# Altium PCB PCB-LAYOUT.PcbDoc (part 1 of 3)
Units mm, origin at the board's own origin, x right, y up, seen from the top; angles counter-clockwise.
Board outline 90 x 80.5 mm, 4 copper layers (Top Layer, Int1 (GND), Int2 (PWR), Bottom Layer), stack 1.564 mm thick; 224 components, 118 nets, 645 pads, 657 vias.
Unrouted connection lines stored in the file: 1.
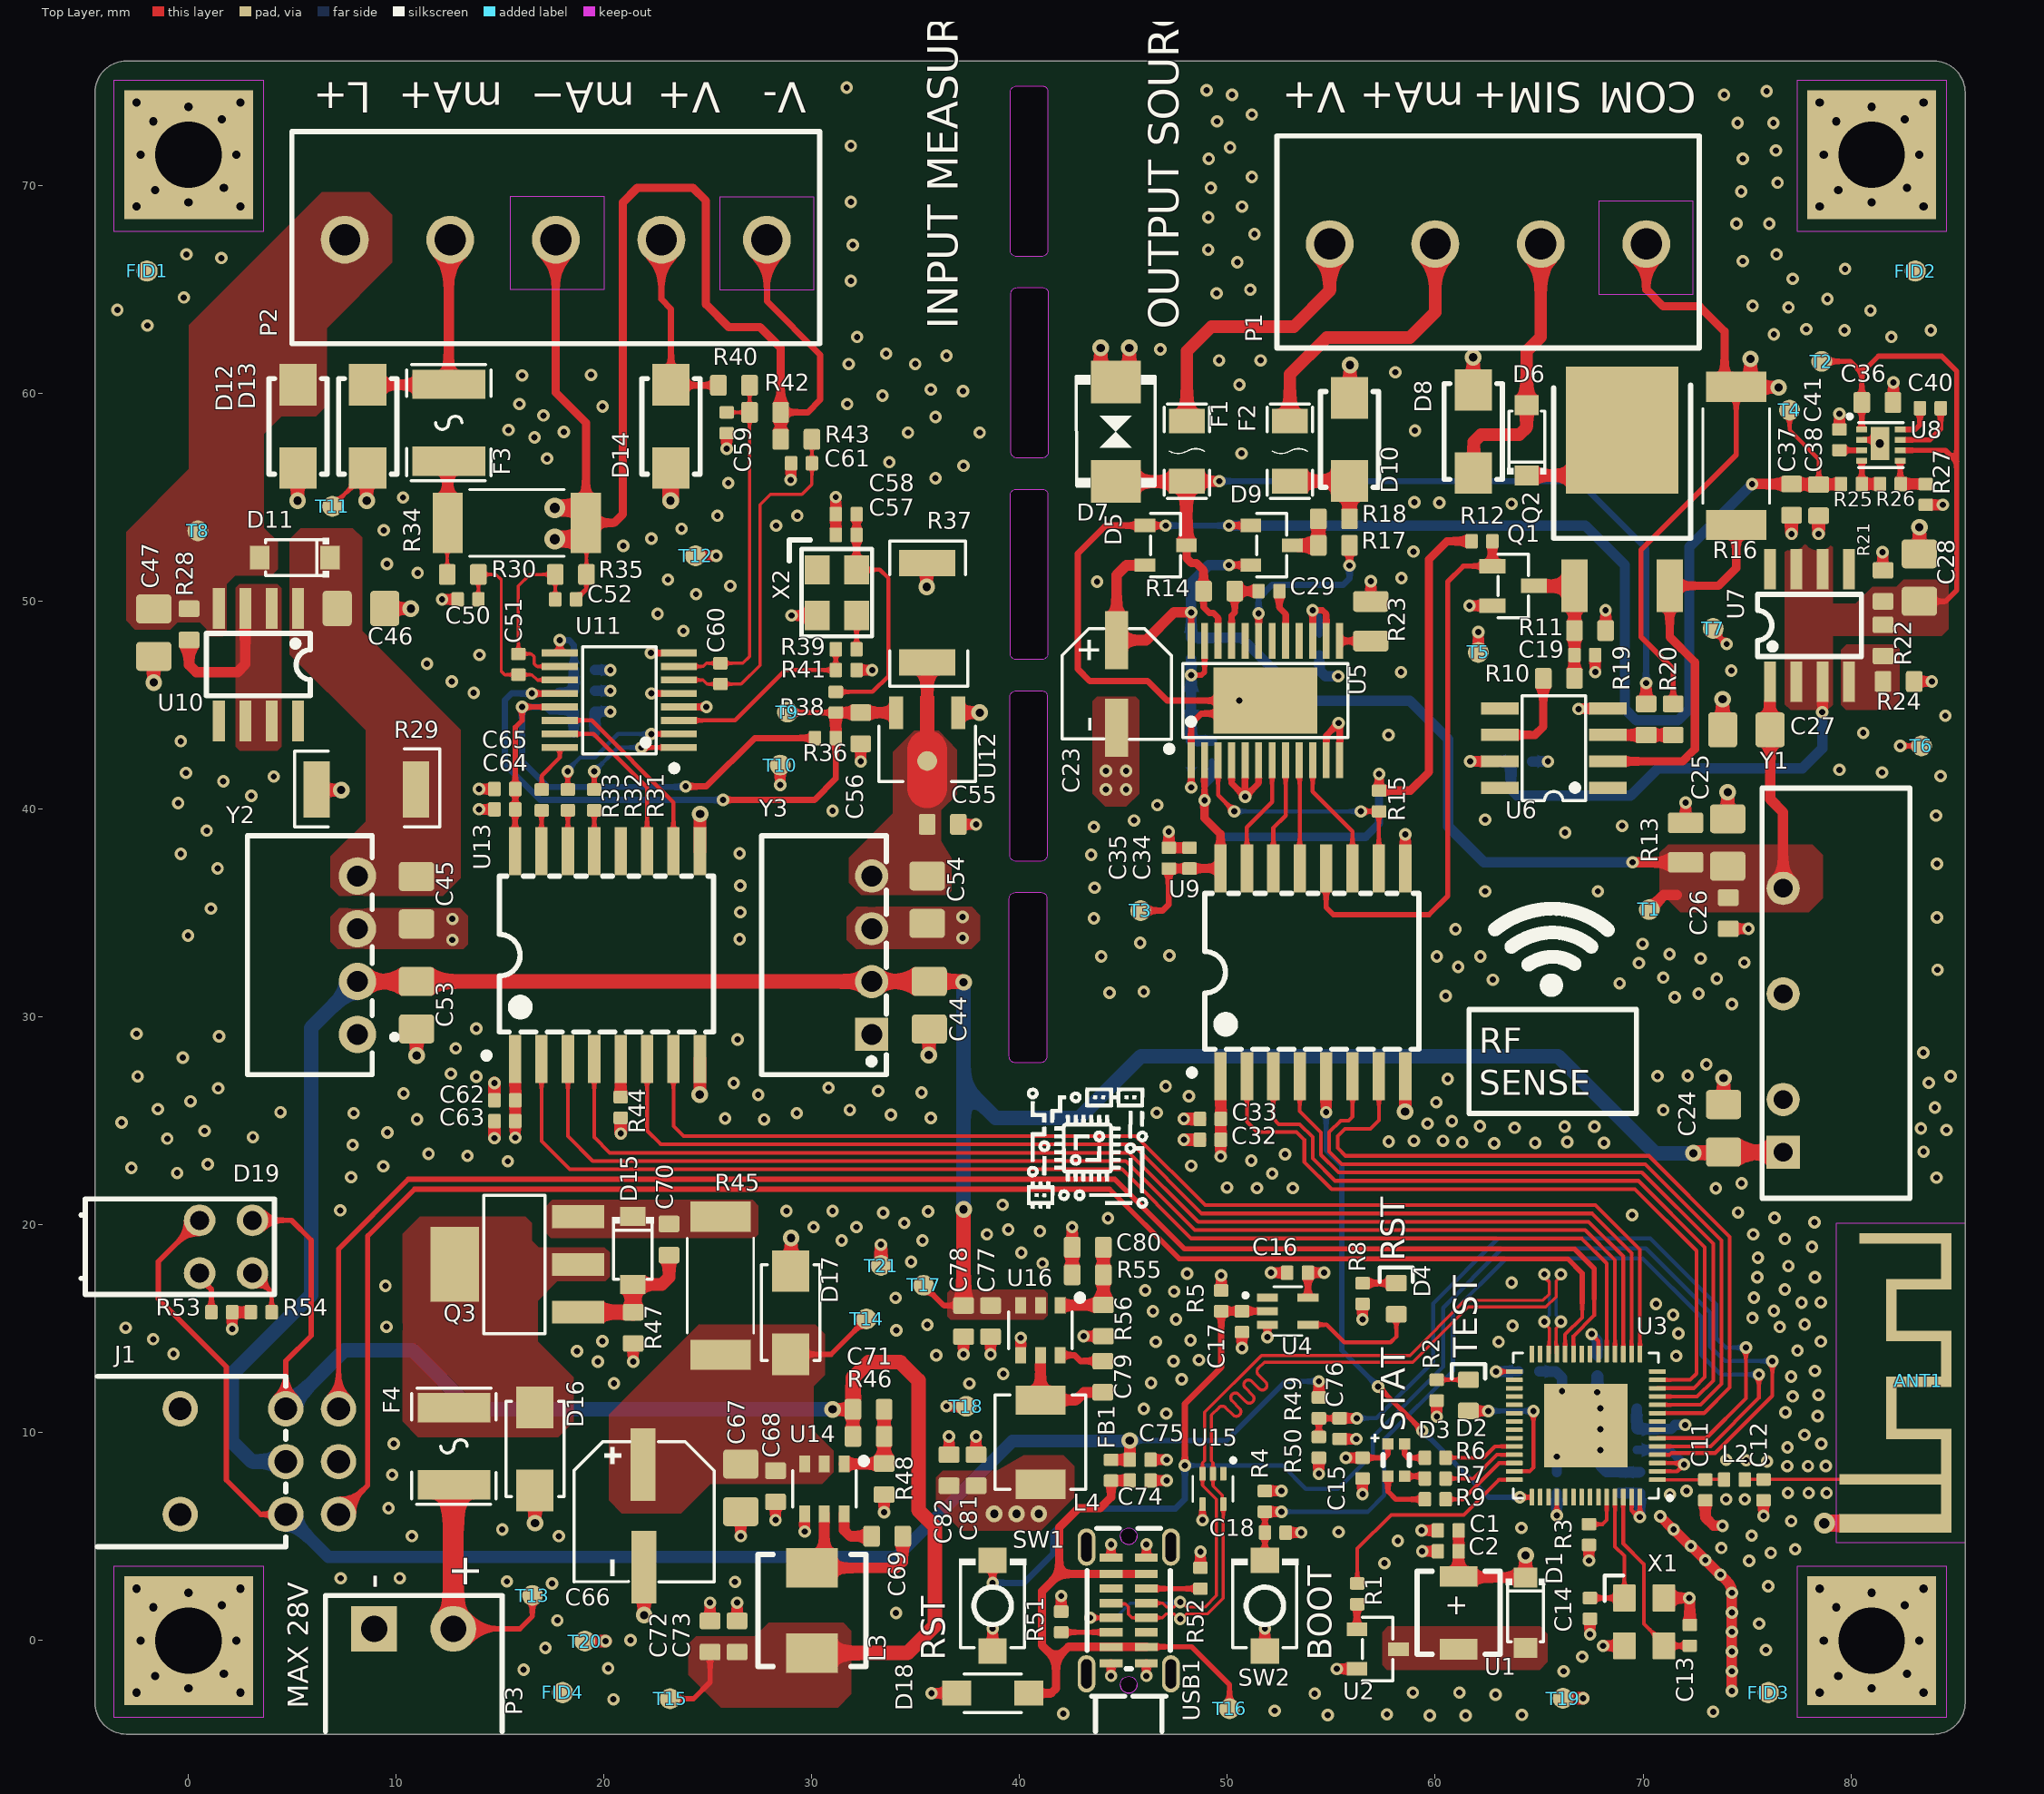
[diagram p0: Top Layer view]
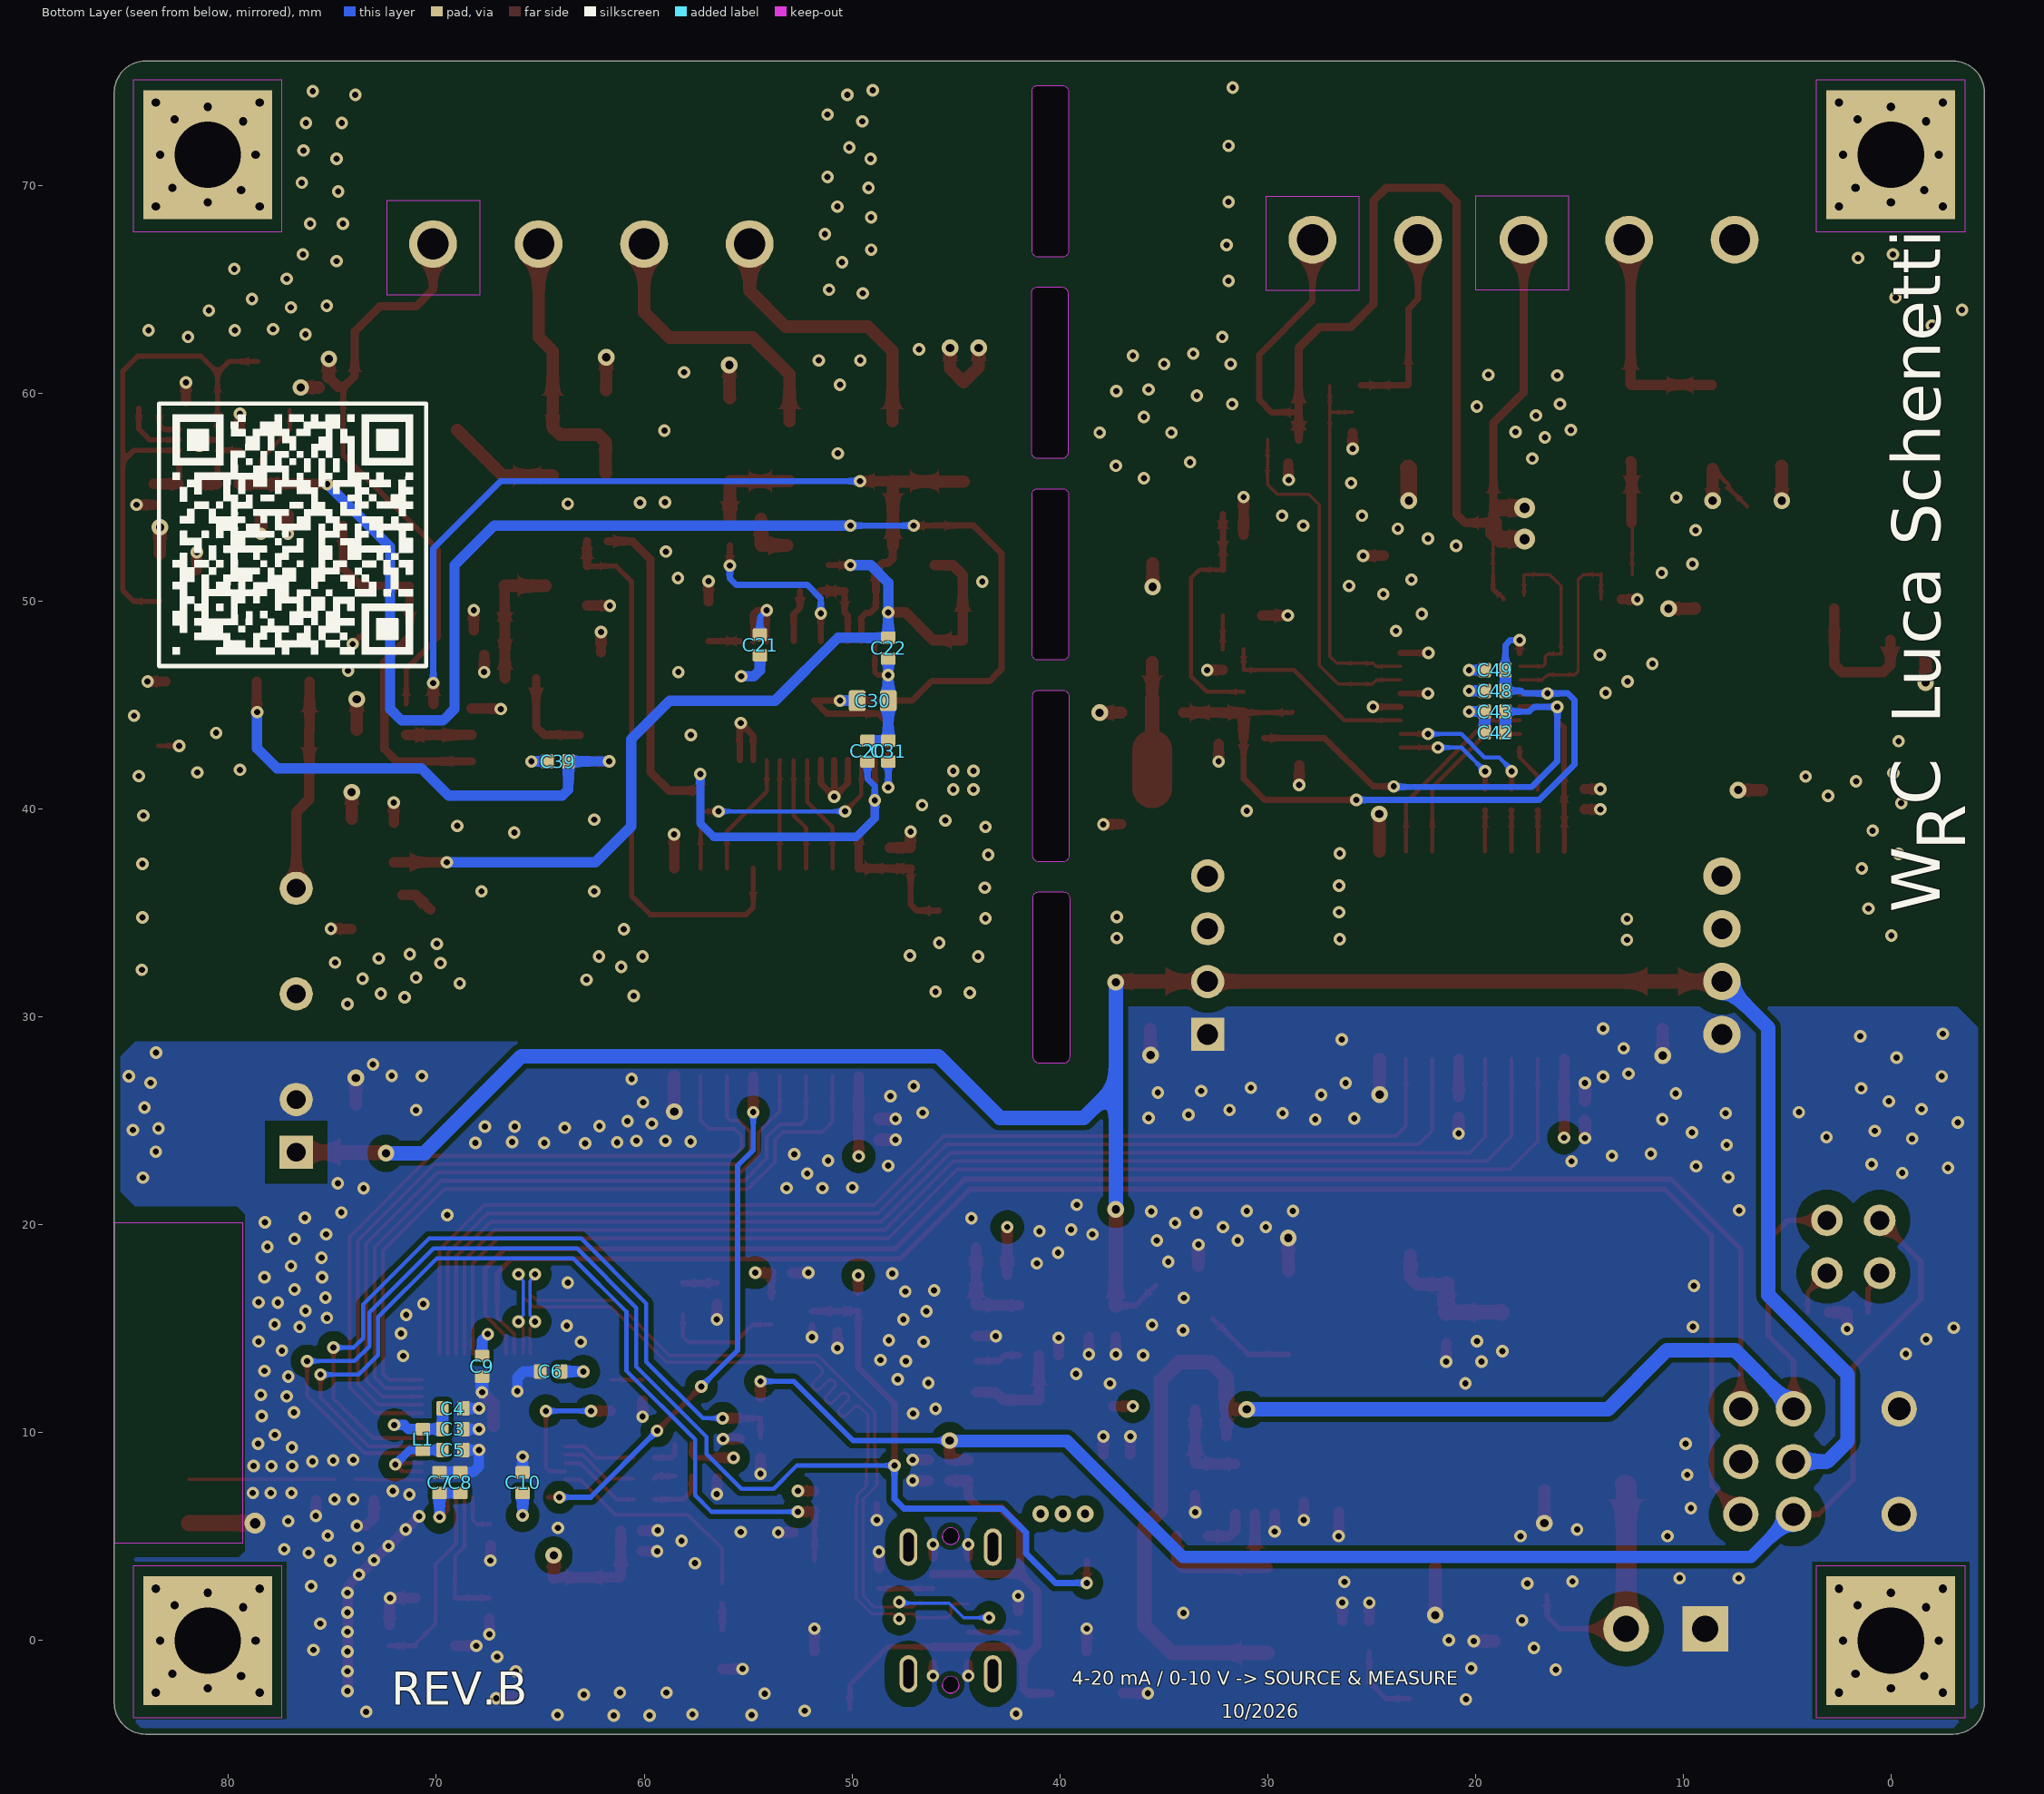
[diagram p1: Bottom Layer view, seen from below]
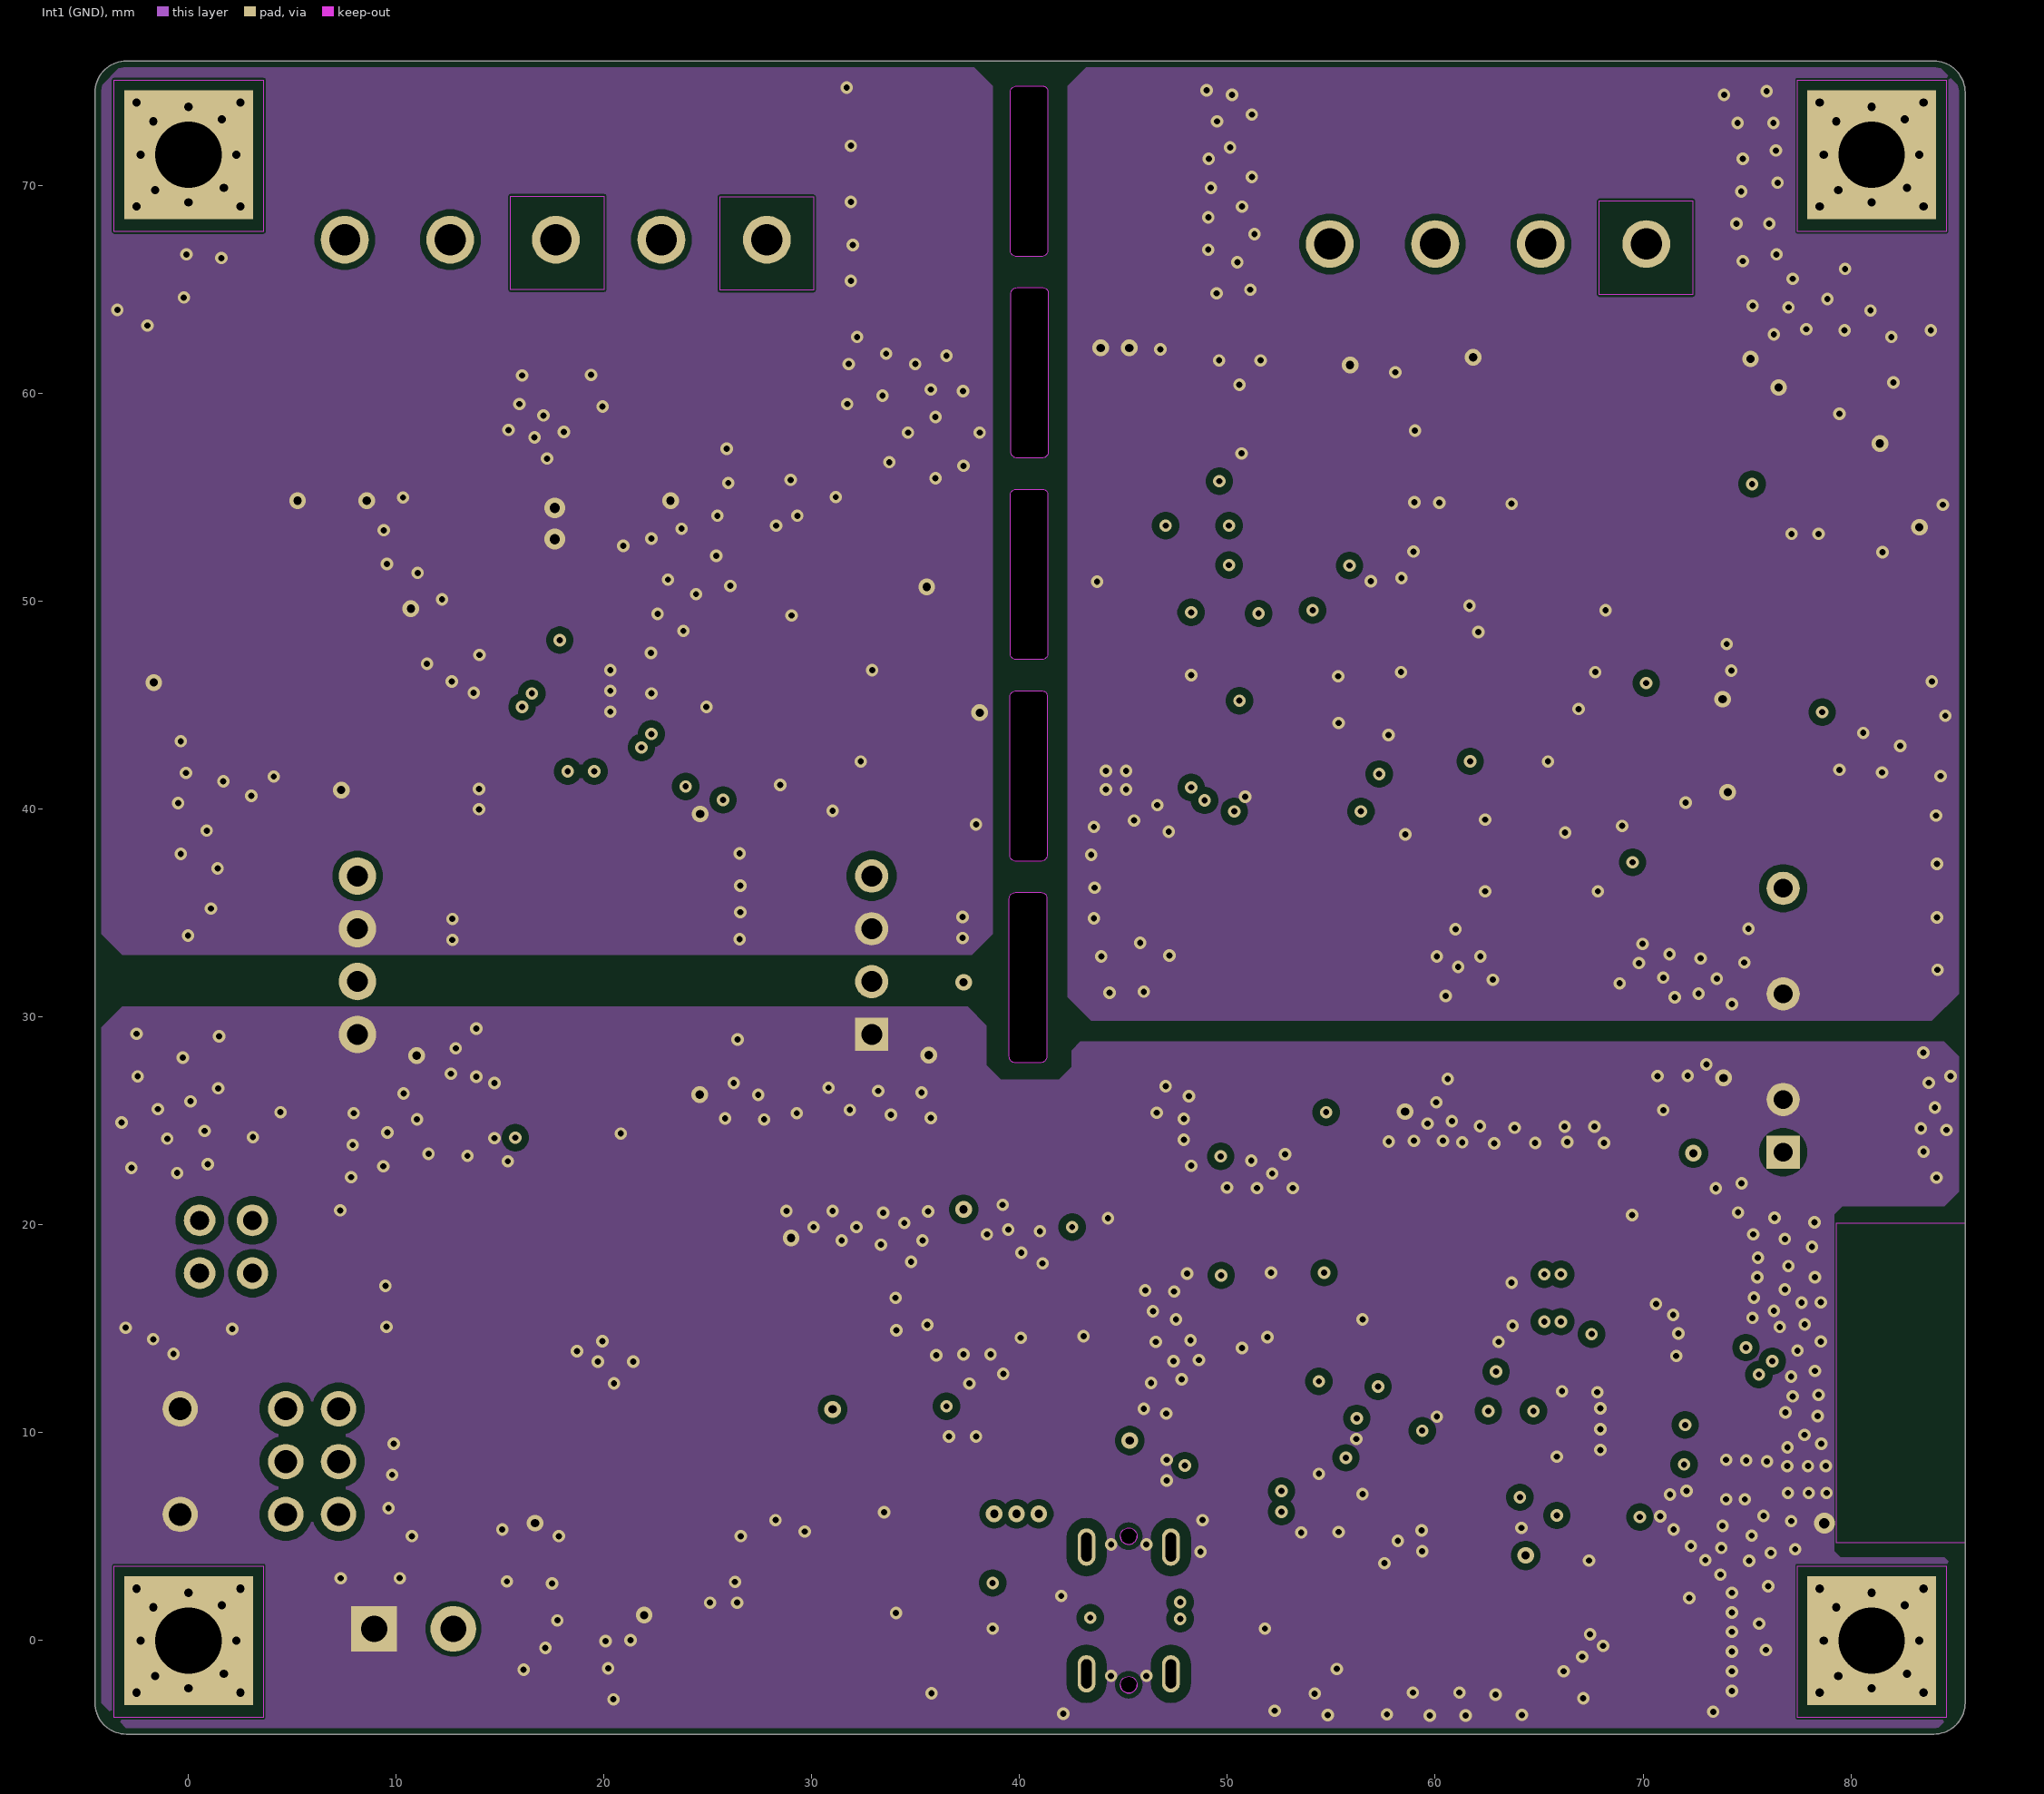
[diagram p2: Int1 (GND)]
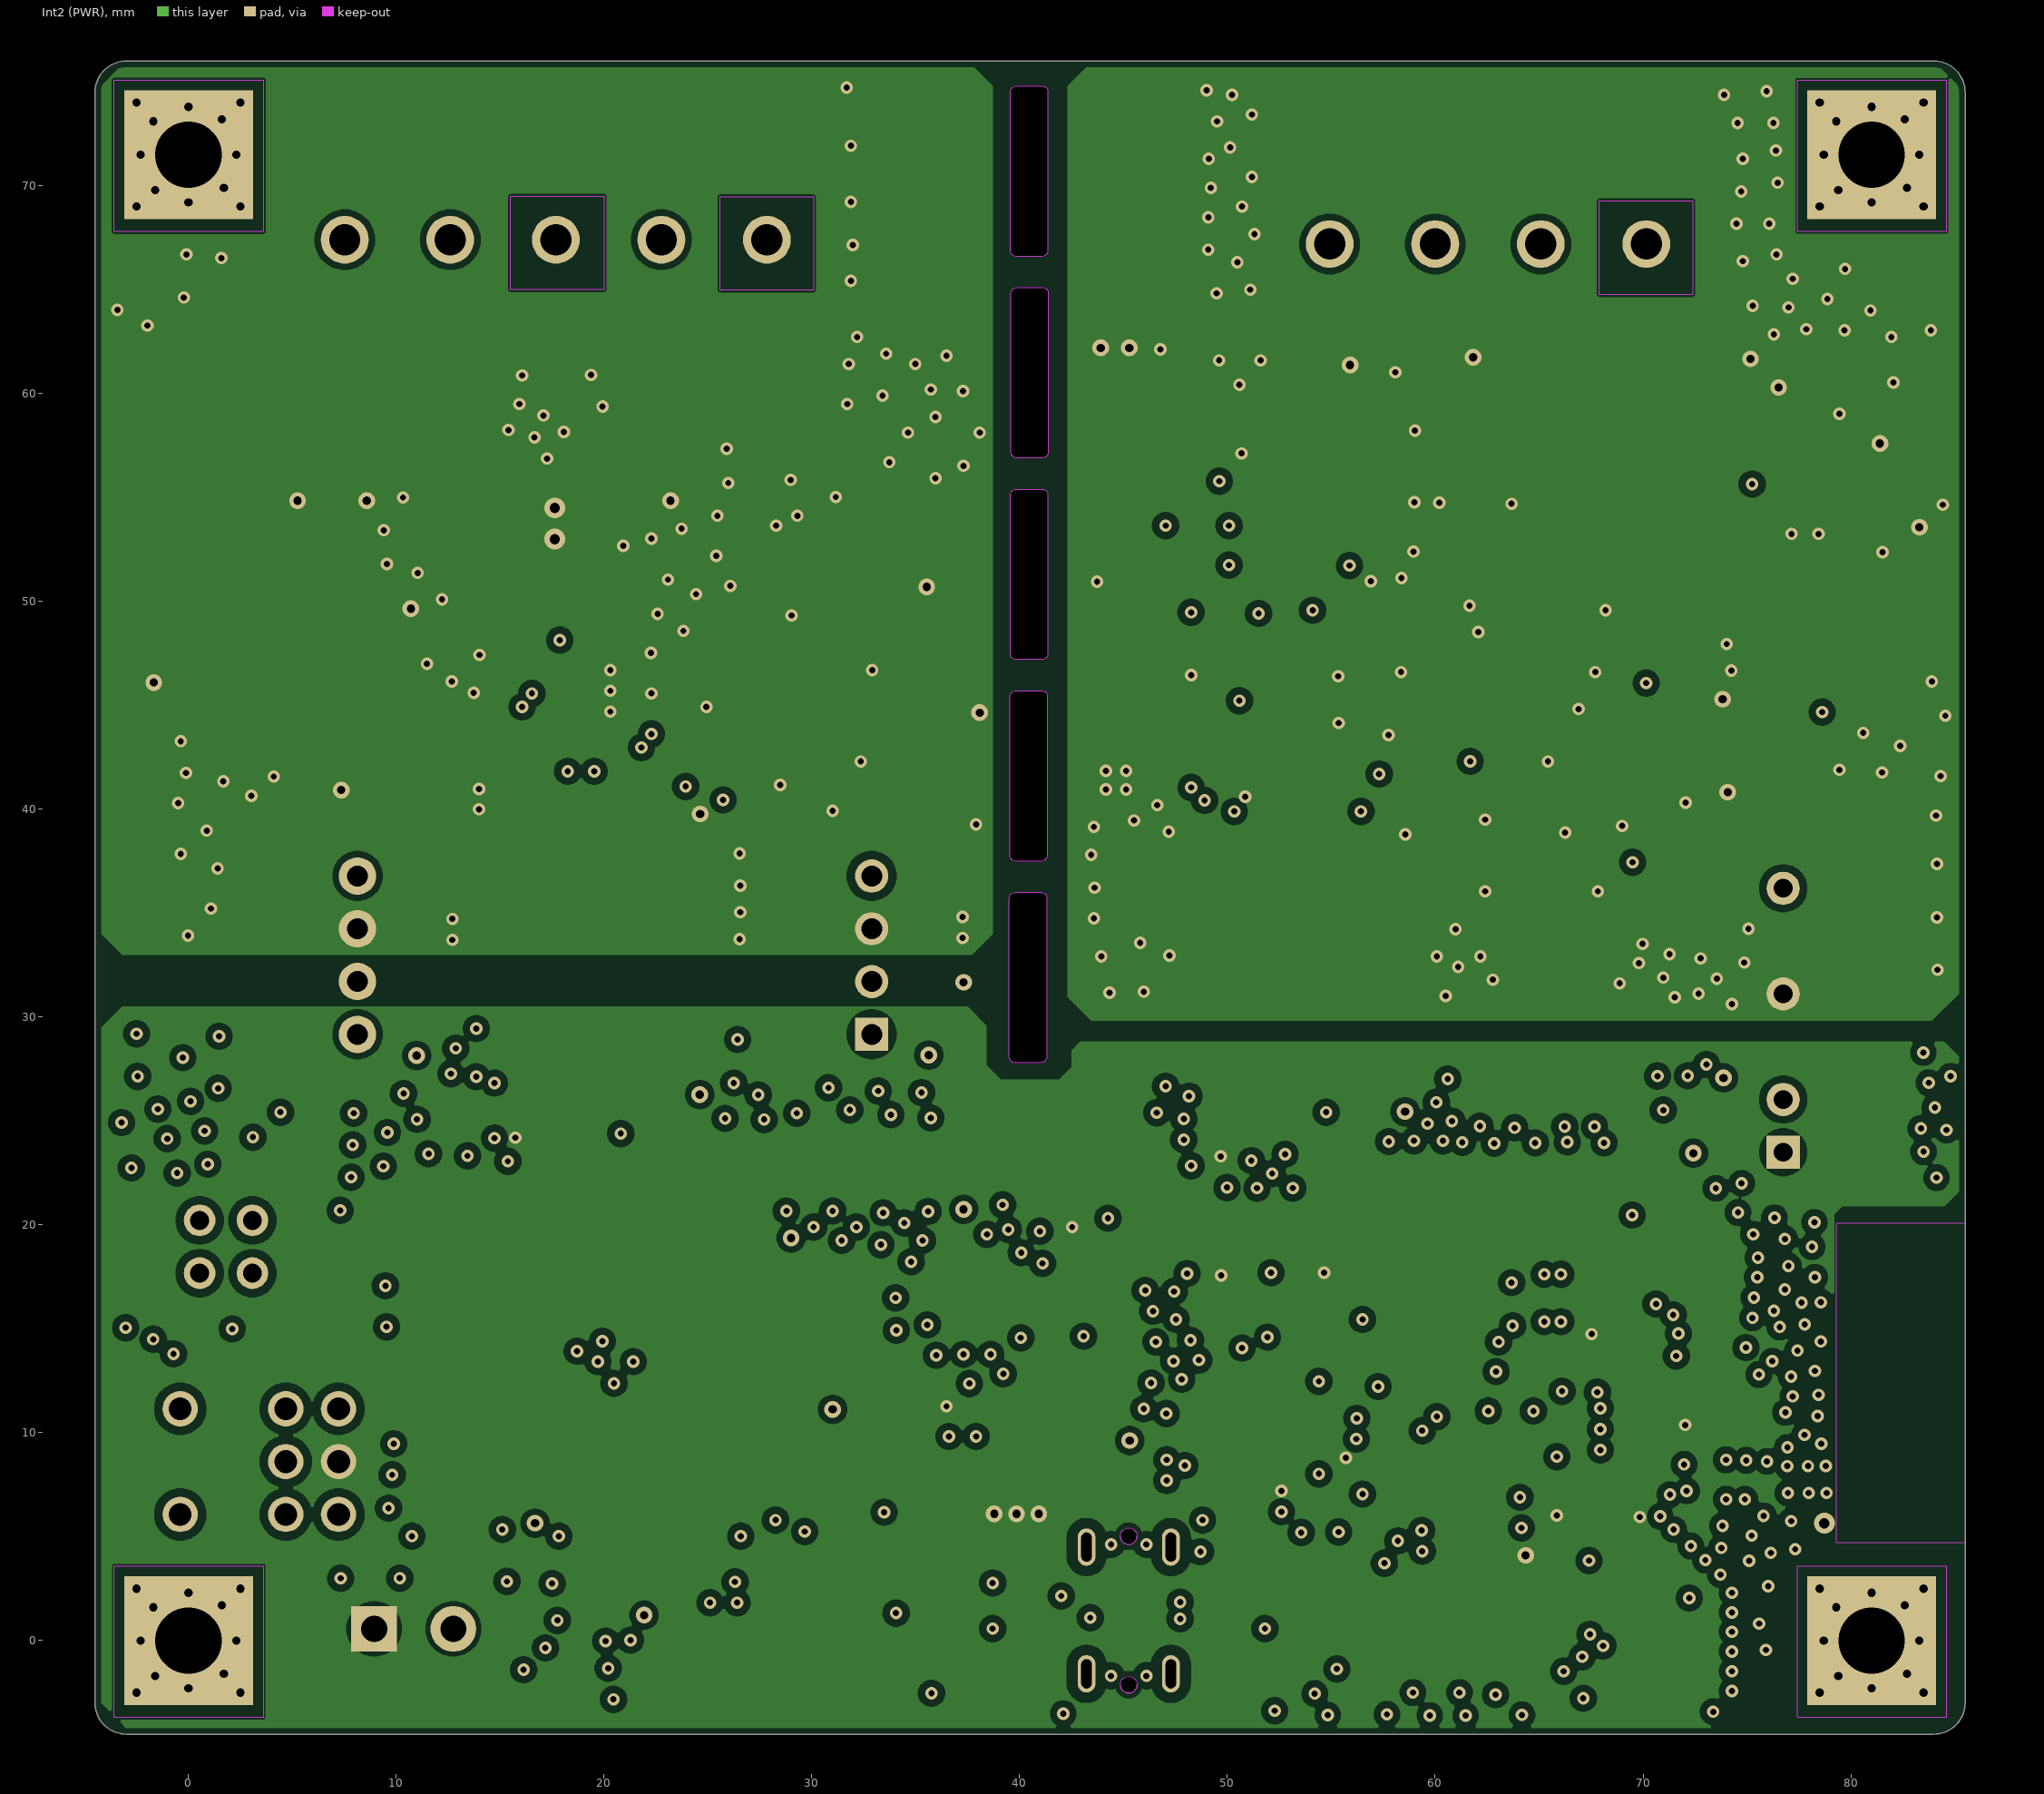
[diagram p3: Int2 (PWR)]
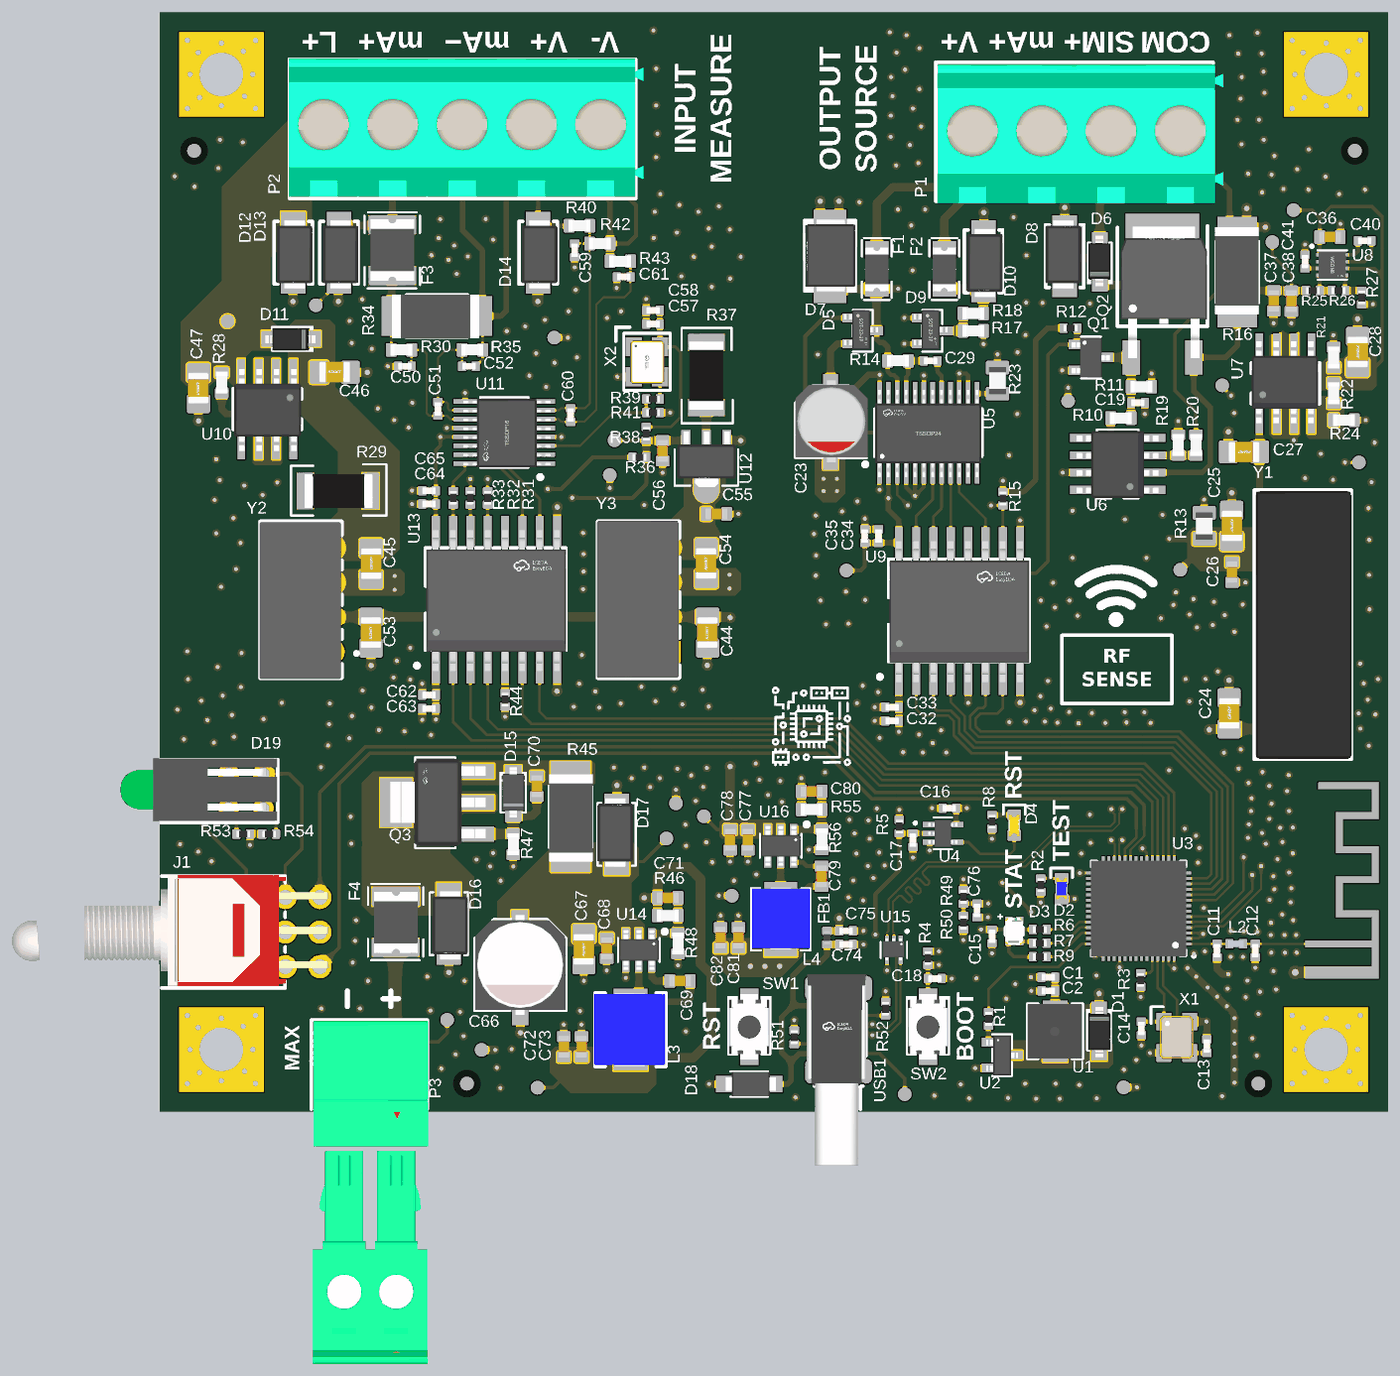
[diagram p6: 3D render of the assembled board from above, using the file's embedded part models]
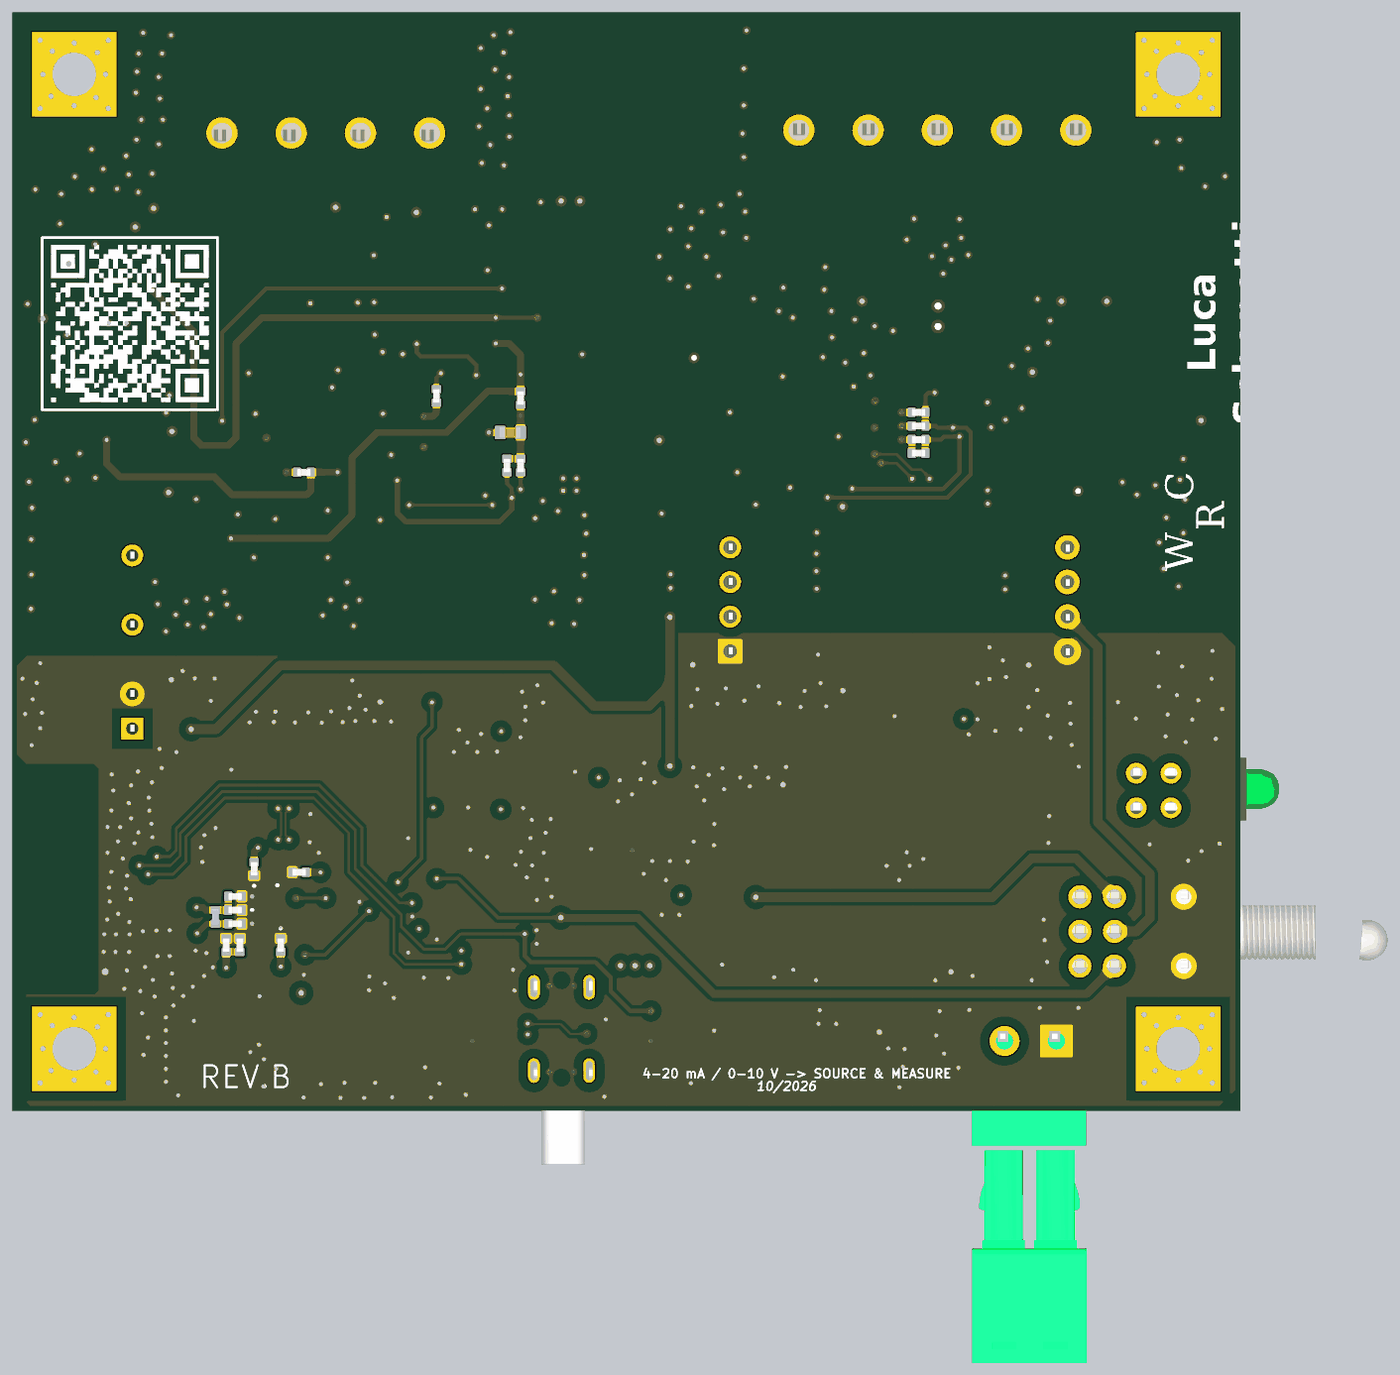
[diagram p7: 3D render of the assembled board from below, using the file's embedded part models]

## Layer stack, top to bottom
Top Solder: solder mask 0.0254, SM-001, Dk 4
Top Layer: signal copper 0.035
Dielectric 1: prepreg 0.0994, PP-017, Dk 4.3
Int1 (GND): signal copper 0.0152
Dielectric 3: core 1.265, Core-039, Dk 4.8
Int2 (PWR): signal copper 0.0152
Dielectric 5: prepreg 0.0994, PP-017, Dk 4.3
Bottom Layer: signal copper 0.035
Bottom Solder: solder mask 0.0254, SM-001, Dk 4

## Board outline
-3,-4.5 cw(c-3,-3) -4.5,-3 -4.5,74.5 cw(c-3,74.5) -3,76 84,76 cw(c84,74.5) 85.5,74.5 85.5,-3 cw(c84,-3) 84,-4.5
cut-out: 41.05,36 cw(c41.05,35.75) 41.3,35.75 41.3,28.1 cw(c41,28.1) 41,27.8 39.8,27.8 cw(c39.8,28.1) 39.5,28.1 39.5,35.7 cw(c39.8,35.7) 39.8,36
cut-out: 41.075,45.7 cw(c41.075,45.45) 41.325,45.45 41.325,37.8 cw(c41.025,37.8) 41.025,37.5 39.825,37.5 cw(c39.825,37.8) 39.525,37.8 39.525,45.4 cw(c39.825,45.4) 39.825,45.7
cut-out: 41.1,55.4 cw(c41.1,55.15) 41.35,55.15 41.35,47.5 cw(c41.05,47.5) 41.05,47.2 39.85,47.2 cw(c39.85,47.5) 39.55,47.5 39.55,55.1 cw(c39.85,55.1) 39.85,55.4
cut-out: 41.125,65.1 cw(c41.125,64.85) 41.375,64.85 41.375,57.2 cw(c41.075,57.2) 41.075,56.9 39.875,56.9 cw(c39.875,57.2) 39.575,57.2 39.575,64.8 cw(c39.875,64.8) 39.875,65.1
cut-out: 41.1,74.8 cw(c41.1,74.55) 41.35,74.55 41.35,66.9 cw(c41.05,66.9) 41.05,66.6 39.85,66.6 cw(c39.85,66.9) 39.55,66.9 39.55,74.5 cw(c39.85,74.5) 39.85,74.8

## Design rules (kind name [scope] priority, off if disabled: settings)
BoardOutlineClearance [All] p1: gap=0.2 ignorepadtopadclearanceinfootprint=FALSE except(0: Arc-SplitContinuation Track-SplitContinuation SMDPad-SplitContinuation THPad-SplitContinuation Via-SplitContinuation Fill-SplitContinuation Poly-SplitContinuation Region-SplitContinuation Text-SplitContinuation; 0.001: Track-OutlineEdge; 0.3: Arc-OutlineEdge Arc-SplitBarrior Track-SplitBarrior SMDPad-OutlineEdge SMDPad-SplitBarrior THPad-OutlineEdge THPad-SplitBarrior Via-OutlineEdge Via-SplitBarrior Fill-OutlineEdge Fill-SplitBarrior Poly-OutlineEdge Poly-SplitBarrior Region-OutlineEdge Region-SplitBarrior Text-OutlineEdge Text-SplitBarrior)
Clearance [All] p1: gap=0.1 ignorepadtopadclearanceinfootprint=TRUE except(0: Arc-Arc Arc-Track; 0.15: Arc-Text Track-Text SMDPad-Text THPad-Text Via-Text Region-Text Text-Text; 0.2: Arc-SMDPad Arc-THPad Arc-Via SMDPad-SMDPad SMDPad-THPad SMDPad-Via SMDPad-Poly THPad-Via Via-Via Poly-Hole; 0.25: Track-Poly; 0.275: Arc-Hole Track-Hole; 0.4: Arc-Fill Arc-Poly Track-Fill SMDPad-Fill Via-Fill Fill-Fill Fill-Poly Poly-Poly; 0.45: THPad-THPad; 0.5: Via-Poly Fill-Text Fill-Hole Poly-Text; 0.7: THPad-Poly; 1: THPad-Fill)
DiffPairsRouting DiffPairsRouting_USB [InDifferentialPairClass('DIFF_USB_90Ω')] p1: maxlimit=0.234 minlimit=0.18 mostfreqgap=0.234 toplayer_maxgap=0.18 toplayer_prefgap=0.18 toplayer_minwidth=0.146 toplayer_maxwidth=0.146 toplayer_prefwidth=0.146 bottomlayer_maxgap=0.18 bottomlayer_prefgap=0.18 bottomlayer_minwidth=0.146 bottomlayer_maxwidth=0.146 bottomlayer_prefwidth=0.146 impedanceprofiledriven=TRUE impedanceprofileid={1DC226F2-B0FA-4F82-BAED-851CE40D1095} impedanceprofilevalue=90.000000 maxuncoupledlength=30
Height [All] p1: minheight=0 maxheight=1000 prefheight=12.7
HoleSize [All] p1: absolutevalues=TRUE maxlimit=5 minlimit=0.3 maxpercent=80.000 minpercent=20.000
HoleToHoleClearance [All] p1: gap=0.254 allowstackedmicrovias=FALSE
MinimumSolderMaskSliver [All] p1: minsoldermaskwidth=0
PlaneConnect [All] p1: planeconnectstyle=Direct reliefexpansion=0.508 reliefentries=4 reliefconductorwidth=0.254 reliefairgap=0.254
PolygonConnect [All] p1: connectstyle=Direct reliefconductorwidth=0.254 reliefentries=4 polygonreliefangle="90 Angle" airgapwidth=0.254
RoutingVias [All] p1: holewidth=0.3 width=0.6 viastyle="Through Hole" minholewidth=0.3 minwidth=0.4 maxholewidth=2 maxwidth=5
SilkToSilkClearance [All] p1: silktosilkclearance=0.15
SilkToSolderMaskClearance [IsPad] p1: minsilkscreentomaskgap=0 clearancetoexposedcopper=TRUE
SolderMaskExpansion [All] p1: expansion=0.102 istentingtop=FALSE
UnRoutedNet [All] p1: checkbadconnections=TRUE
Width "Antenna 1" [InNet('LNA_IN_A')] p1: maxlimit=0.151 minlimit=0.127 preferedwidth=0.151 toplayer_minwidth=0.151 bottomlayer_minwidth=0.151 impedanceprofiledriven=TRUE impedanceprofileid={3F663633-82B3-4F44-8612-F3D688D30A75} impedanceprofilevalue=50.000000 minimp=50.000000 maximp=50.000000 favimp=50.000000
Width Antenna [InNet('LNA_IN')] p2: maxlimit=0.151 minlimit=0.127 preferedwidth=0.151 toplayer_minwidth=0.151 bottomlayer_minwidth=0.151 impedanceprofiledriven=TRUE impedanceprofileid={3F663633-82B3-4F44-8612-F3D688D30A75} impedanceprofilevalue=50.000000 minimp=50.000000 maximp=50.000000 favimp=50.000000
Width [All] p3: maxlimit=3 minlimit=0.01 preferedwidth=0.2 minimp=50.000000 maximp=50.000000 favimp=50.000000
21 further rules are at their usual default settings.

## Classes and differential pairs
differential pair class DIFF_USB_90Ω: USB-C_MCU_D
component class "PWR RAIL": C66 C67 C68 C69 C70 C71 C72 C73 C74 C75 C76 C77 C78 C79 C80 C81 C82 D15 D16 D17 D18 D19 F4 FB1 FID1 FID2 FID3 FID4 J1 L3 L4 P3 P4 Q3 R45 R46 R47 R48 R49 R50 R51 R52 R53 R54 R55 R56 T13 T14 T15 T16 T17 T18 T19 T20 T21 U14 U15 U16 USB1
component class MCU: ANT1 C1 C2 C3 C4 C5 C6 C7 C8 C9 C10 C11 C12 C13 C14 C15 C16 C17 C18 D1 D2 D3 D4 L1 L2 R1 R2 R3 R4 R5 R6 R7 R8 R9 SW1 SW2 U1 U2 U3 U4 X1
component class DAC: C19 C20 C21 C22 C23 C24 C25 C26 C27 C28 C29 C30 C31 C32 C33 C34 C35 C36 C37 C38 C39 C40 C41 D5 D6 D7 D8 D9 D10 F1 F2 P1 Q1 Q2 R10 R11 R12 R13 R14 R15 R16 R17 R18 R19 R20 R21 R22 R23 R24 R25 R26 R27 T1 T2 T3 T4 T5 T6 T7 U5 U6 U7 U8 U9 Y1
component class ADC: C42 C43 C44 C45 C46 C47 C48 C49 C50 C51 C52 C53 C54 C55 C56 C57 C58 C59 C60 C61 C62 C63 C64 C65 D11 D12 D13 D14 F3 P2 R28 R29 R30 R31 R32 R33 R34 R35 R36 R37 R38 R39 R40 R41 R42 R43 R44 T8 T9 T10 T11 T12 U10 U11 U12 U13 X2 Y2 Y3
differential pair USB-C_MCU_D: +USB-C_MCU_D_P -USB-C_MCU_D_N

## Components (designator, comment, footprint, x,y, rotation, side; value= is the part's Value field where it differs from the comment)
ANT1 "PCB Antenna 2.4GHz 50Ohm" ANT_IFA_USB_2_4GHZ_50R 79.45,5.65 r90 top
C1 "10u" CAP_0402 60.625,5.3 r0 top
C2 "100n" CAP_0402 60.625,4.3 r0 top
C3 "10u" CAP_0402 69.2,10.175 r0 bottom
C4 "100n" CAP_0402 69.2,11.175 r0 bottom
C5 "1u" CAP_0402 69.2,9.175 r0 bottom
C6 "1u" CAP_0402 64.5,12.95 r180 bottom
C7 "1u" CAP_0402 69.85,7.6 r270 bottom
C8 "100n" CAP_0402 68.85,7.6 r270 bottom
C9 "100n" CAP_0402 67.8,13.2 r90 bottom
C10 "100n" CAP_0402 65.85,7.6 r270 bottom
C11 "1p2" CAP_0402 73,7.25 r90 top
C12 "1p5" CAP_0402 75.8,7.25 r90 top
C13 "15p" CAP_0402 72.25,0.25 r270 top
C14 "15p" CAP_0402 67.45,1.55 r90 top
C15 "100n" CAP_0402 56.5,8.3 r90 top
C16 "100n" CAP_0402 53.375,17.7 r0 top
C17 "100n" CAP_0402 50.7,15.35 r90 top
C18 "100n" CAP_0402 52.3,5.2 r180 top
C19 "22n" CAP_0402 67.2,47.425 r180 top
C20 "100n" CAP_0402 49.25,42.8 r270 bottom
C21 "100n" CAP_0402 54.425,47.9 r90 bottom
C22 "100n" CAP_0402 48.25,47.75 r90 bottom
C23 "10u" CAP_ALEL_5x5.4 44.75,46.1 r270 top
C24 "4u7" CAP_0805 73.875,24.65 r270 top
C25 "10u" CAP_0805 74.075,38.4 r270 top
C26 "100n" CAP_0603 74.1,35 r90 top
C27 "10u" CAP_0805 74.975,43.825 r180 top
C28 "1u" CAP_0805 83.3,51.15 r270 top
C29 "4n7" CAP_0402 52,50.5 r0 top
C30 "10u" CAP_0603 49,45.225 r0 bottom
C31 "100n" CAP_0402 48.25,42.8 r270 bottom
C32 "1u" CAP_0402 49.175,24.1 r0 top
C33 "100n" CAP_0402 49.175,25.1 r0 top
C34 "100n" CAP_0402 47.175,37.65 r270 top
C35 "1u" CAP_0402 48.175,37.65 r270 top
C36 "10u" CAP_0603 81.277,59.576 r180 top
C37 "10u" CAP_0603 77.15,54.9 r90 top
C38 "10u" CAP_0603 78.45,54.875 r90 top
C39 "100n" CAP_0402 64.15,42.3 r180 bottom
C40 "1u" CAP_0402 83.825,59.3 r180 top
C41 "4u7" CAP_0402 79.452,57.776 r270 top
C42 "10u" CAP_0402 19.05,43.7 r180 bottom
C43 "100n" CAP_0402 19.05,44.7 r180 bottom
C44 "1u" CAP_0805 35.65,30.575 r90 top
C45 "1u" CAP_0805 10.975,35.625 r270 top
C46 "1u" CAP_0805 8.3,49.663 r0 top
C47 "1u" CAP_0805 -1.675,48.5 r90 top
C48 "10u" CAP_0402 19.05,45.7 r180 bottom
C49 "100n" CAP_0402 19.05,46.7 r180 bottom
C50 "2n7" CAP_0402 13.45,50.1 r180 top
C51 "27n" CAP_0402 15.875,46.975 r270 top
C52 "2n7" CAP_0402 18.15,50.1 r180 top
C53 "4u7" CAP_0805 10.975,30.575 r90 top
C54 "10u" CAP_0805 35.55,35.65 r90 top
C55 "1u" CAP_0603 36.3,39.275 r180 top
C56 "10u" CAP_0603 32.35,43.9 r90 top
C57 "10u" CAP_0402 31.65,53.2 r0 top
C58 "100n" CAP_0402 31.65,54.2 r0 top
C59 "1n" CAP_0402 25.9,58.6 r270 top
C60 "10n" CAP_0402 25.6,46.525 r90 top
C61 "1n" CAP_0402 29.5,56.65 r180 top
C62 "1u" CAP_0402 15.225,26 r0 top
C63 "100n" CAP_0402 15.225,25 r0 top
C64 "100n" CAP_0402 15.225,40 r0 top
C65 "1u" CAP_0402 15.225,40.975 r0 top
C66 "47u" CAP_ALEL_6.3x5.4 22.1,6.15 r270 top
C67 "10u" CAP_0805 26.575,7.35 r90 top
C68 "100n" CAP_0603 28.25,7.425 r90 top
C69 "100n" CAP_0603 33.625,5.025 r180 top
C70 "47n" CAP_0603 23.125,19.3 r90 top
C71 "47p" CAP_0603 32.725,11.125 r180 top
C72 "22u" CAP_0603 25.1,0.2 r270 top
C73 "22u" CAP_0603 26.4,0.2 r270 top
C74 "2u2" CAP_0402 45.8,7.7 r180 top
C75 "2u2" CAP_0402 45.8,8.7 r180 top
C76 "100n" CAP_0402 55.4,10.2 r90 top
C77 "10u" CAP_0603 38.6,15.375 r90 top
C78 "10u" CAP_0603 37.3,15.375 r90 top
C79 "100n" CAP_0603 44,12.7 r90 top
C80 "56p" CAP_0603 43.275,18.925 r180 top
C81 "22u" CAP_0603 37.9,8.2 r270 top
C82 "22u" CAP_0603 36.6,8.2 r270 top
D1 "DIODE 300mA 75V" 1N4148W 64.3,1.1 r270 top
D2 "BLUE" LED_0603_BLUE 61.6,11.8 r270 top
D3 "RGB_LED" XL-2012RGBC 58.175,8.775 r90 top
D4 "YELLOW" LED_0603_YELLOW 58.125,16.45 r270 top
D5 "Schottky Diodes" BAT54S 46.85,52.425 r180 top
D6 "DIODE 300mA 75V" 1N4148W 64.45,58 r90 top
D7 "TVS 13V Bidirectional" SMBJ13CA 44.65,58.2 r90 top
D8 "BIDI TVS 36V" SMAJ33CA 61.85,58.2 r90 top
D9 "Schottky Diodes" BAT54S 51.95,52.425 r180 top
D10 "BIDI TVS 24V" SMAJ24CA 55.85,57.775 r270 top
D11 "DIODE 300mA 75V" 1N4148W 4.875,52.157 r180 top
D12 "BIDI TVS 36V" SMAJ33CA 5.25,58.4 r270 top
D13 "BIDI TVS 36V" SMAJ33CA 8.6,58.4 r270 top
D14 "BIDI TVS 36V" SMAJ33CA 23.2,58.4 r270 top
D15 "ZENER DIODE 15V" BZT52C15 21.4,18.7 r270 top
D16 "BIDI TVS 30V" SMAJ30CA 16.65,9.2 r270 top
D17 "BIDI TVS 30V" SMAJ30CA 29,15.8 r90 top
D18 "ESD Protection TVS 6.0V" SMF6.0CA 38.7,-2.5 r0 top
D19 "TWO LED GREEN" TJ-L3F2LTQYKMQFLC7K-A5 -0.05,19 r270 top
F1 "PPTC 100mA 60V" JK-nSMD010/60V 48,57.25 r90 top
F2 "PPTC 100mA 60V" JK-nSMD010/60V 52.95,57.25 r90 top
F3 "RESETTABLE FUSE 100mA" BSMD1812-010-60V 12.5,58.6 r90 top
F4 "PTC 60V 500mA" mSMD050-60V 12.775,9.35 r90 top
FB1 "120R" FB_0402 44.4,8.2 r90 top
FID1 "FIDUCIAL" FIDUCIAL -2,65.9 r0 top
FID2 "FIDUCIAL" FIDUCIAL 83.1,65.9 r0 top
FID3 "FIDUCIAL" FIDUCIAL 76.025,-2.5 r0 top
FID4 "FIDUCIAL" FIDUCIAL 18,-2.5 r0 top
J1 "DPDT" 2MD3T2B1M6RES 0,8.75 r270 top
L1 "2nH" IND_0402 70.65,9.675 r270 bottom
L2 "2n7" IND_0402 74.4,7.75 r0 top
L3 "6.8uH" FXL0530-6R8-M 30,1.4 r270 top
L4 "4.7uH" IND-SMD_L4.4-W4.2 41.017,9.613 r90 top
P1 "WJ500V-5.08-4P" WJ500V-5.08-4P 62.759,67.38 r180 top
P2 "WJ500V-5.08-5P" WJ500V-5.08-5P 17.676,67.38 r180 top
P3 "2P PLUGGABLE TERMINAL BLOCK 3.81MM" WJ15EDGRC-3.81-2P 10.9,-2.65 r0 top
P4 "MALE CONN 2P 3.81mm" WJ15EDGK-3.81-2P 10.625,-7.45 r0 top
Q1 "N-Channel Vgs=30V 5.7A" AO3400A 63.851,50.735 r180 top
Q2 "NPN MOSFET 100V" IRLR3110ZTRPBF 69,56.25 r0 top
Q3 "P-Mosfet 60V 3A" BSP315P 15.575,18.1 r0 top
R1 "180R" RES_0402 56.25,2.25 r270 top
R2 "1K" RES_0402 60.075,12.05 r90 top
R3 "5K1" RES_0402 67.4,5.1 r90 top
R4 "5k1" RES_0402 51.8,6.7 r90 top
R5 "1K" RES_0402 49.7,16.35 r90 top
R6 "180R" RES_0402 60,8.8 r180 top
R7 "75R" RES_0402 60,7.8 r180 top
R8 "1K" RES_0402 56.5,16.7 r90 top
R9 "75R" RES_0402 60,6.8 r180 top
R10 "4K7" RES_0603 65.95,46.3 r0 top
R11 "100K" RES_0603 67.45,48.6 r0 top
R12 "100K" RES_0402 62.25,52.9 r0 top
R13 "10K" RES_0805 72.05,38.4 r270 top
R14 "33R" RES_0603 49.6,50.5 r180 top
R15 "10K" RES_0402 57.3,40.4 r90 top
R16 "25R5" RES_2512 74.5,57 r90 top
R17 "33R" RES_0603 55.125,52.7 r180 top
R18 "47R" RES_0603 55.125,53.975 r0 top
R19 "15K4" RES_0603 70.15,44.325 r90 top
R20 "1K" RES_0603 71.45,44.325 r270 top
R21 "2K2" RES_0603 81.55,50.75 r270 top
R22 "240R" RES_0603 81.55,48.125 r90 top
R23 "15K" RES_0805 56.9,49.05 r270 top
R24 "715R" RES_0603 82.3,46.15 r180 top
R25 "10R" RES_0402 80.027,55.651 r180 top
R26 "1M13" RES_0402 81.902,55.651 r180 top
R27 "499K" RES_0402 83.602,55.15 r90 top
R28 "47R" RES_0603 0.025,48.9 r90 top
R29 "5K1" RES_2010 8.85,40.9 r0 top
R30 "4K12" RES_0603 13.2,51.3 r0 top
R31 "47R" RES_0402 19.525,40.45 r270 top
R32 "47R" RES_0402 18.25,40.45 r270 top
R33 "47R" RES_0402 17,40.45 r270 top
R34 "25R5" RES_2512 15.8,53.8 r180 top
R35 "4K12" RES_0603 18.4,51.3 r180 top
R36 "10R" RES_0402 30.65,43.425 r180 top
R37 "470R" RES_2010 35.495,49.164 r270 top
R38 "10R" RES_0402 31.15,45.15 r90 top
R39 "47R" RES_0402 31.65,47.7 r0 top
R40 "90K9" RES_0603 26.25,60.4 r0 top
R41 "10K" RES_0402 31.65,46.7 r180 top
R42 "10K" RES_0603 27.75,59.1 r180 top
R43 "9K09" RES_0603 29.25,57.8 r0 top
R44 "10K" RES_0402 20.8,25.65 r270 top
R45 "4R7" RES_2512 25.583,17.075 r270 top
R46 "158K" RES_0603 32.725,9.825 r180 top
R47 "100K" RES_0603 21.4,15.05 r90 top
R48 "30K1" RES_0603 33.475,7.775 r90 top
R49 "150K" RES_0402 54.4,11.2 r90 top
R50 "68K" RES_0402 54.4,9.3 r90 top
R51 "5K1" RES_0402 42,0.9 r270 top
R52 "5K1" RES_0402 48.7,3 r270 top
R53 "1K" RES_0402 1.6,15.8 r180 top
R54 "1K" RES_0402 3.5,15.8 r0 top
R55 "93K1" RES_0603 43.275,17.6 r180 top
R56 "30K1" RES_0603 44.025,15.4 r90 top
SW1 "TS-1088-AR02016" TS-1088-AR02016 38.7,1.65 r90 top
SW2 "TS-1088-AR02016" TS-1088-AR02016 51.8,1.65 r90 top
T1 "TP_S" "TP 1mm" 70.3,35.175 r0 top
T2 "TP_S" "TP 1mm" 78.6,61.55 r0 top
T3 "TP_S" "TP 1mm" 45.825,35.125 r0 top
T4 "TP_S" "TP 1mm" 77.054,59.204 r0 top
T5 "TP_S" "TP 1mm" 62.075,47.55 r0 top
T6 "TP_S" "TP 1mm" 83.4,43.05 r180 top
T7 "TP_S" "TP 1mm" 73.375,48.7 r0 top
T8 "TP_S" "TP 1mm" 0.45,53.4 r0 top
T9 "TP_S" "TP 1mm" 28.825,44.675 r0 top
T10 "TP_S" "TP 1mm" 28.475,42.125 r0 top
T11 "TP_S" "TP 1mm" 6.925,54.575 r0 top
T12 "TP_S" "TP 1mm" 24.4,52.2 r0 top
T13 "TP_S" "TP 1mm" 16.55,2.175 r0 top
T14 "TP_S" "TP 1mm" 32.625,15.475 r0 top
T15 "TP_S" "TP 1mm" 23.175,-2.8 r0 top
T16 "TP_S" "TP 1mm" 50.1,-3.275 r0 top
T17 "TP_S" "TP 1mm" 35.375,17.1 r0 top
T18 "TP_S" "TP 1mm" 37.425,11.275 r0 top
T19 "TP_S" "TP 1mm" 66.15,-2.775 r0 top
T20 "TP_S" "TP 1mm" 19.075,-0.025 r0 top
T21 "TP_S" "TP 1mm" 33.325,18.05 r0 top
U1 "Passive Buzzer 4kHz" KLJ-4020 61.2,1.2 r270 top
U2 "TRANSISTOR NPN" SS8050 57.175,-0.3 r180 top
U3 "ESP32-S3 8MB IN FLASH" ESP32-S3FN8 67.25,10.362 r180 top
U4 "Schmitt Trigger 1.65V~5.5V" 74LVC1G14GW,125 52.9,15.85 r0 top
U5 "Digital to Analog Converters 12 SPI Voltage Buffer" AD5412AREZ-REEL7 51.824,45.232 r0 top
U6 "Precision Op Amps" OP184ESZ-REEL7 65.55,42.6 r90 top
U7 "LDO 100mA 2,2-37V" LM317LDR2G 78.05,48.75 r0 top
U8 "INVERTED CHARGE PUMP 2.7V~5.5V" LM27761DSGR 81.45,57.525 r270 top
U9 "Digital Isolators 4 IN - 2 OUT" NSI8262W1-DSWR 54.25,32 r0 top
U10 "LDO 100mA 2,2-37V" LM317LDR2G 3.325,47.057 r180 top
U11 "ADC 24-Bit 4-Channel" ADS1220IPWR 20.8,45.4 r90 top
U12 "LDO 3,3V 250mA" HT7333-A 35.549,42.326 r90 top
U13 "Digital Isolators 4 IN - 2 OUT" NSI8262W1-DSWR 20.3,32.825 r0 top
U14 "3.8V~32V 3A 500kHz" AP63301WU-7 30.498,7.368 r90 top
U15 "TVS USB 2.0 ±25-kV" TPD2E2U06DRLR 49.3,7.3 r270 top
U16 "3.8V~32V 3A 500kHz" AP63301WU-7 40.9,15 r90 top
USB1 "USB-C CONNECTOR 16P VERTICAL" TYPEC-305-ACP16H458 45.288,0.635 r270 top
X1 "40MHz" XTAL_3225 70.05,0.9 r270 top
X2 "4.096MHz CMOS ±10ppm ±20ppm" OT32254.096MJBA4SL 31.2,50.425 r270 top
Y1 "Isolated Power IN 4.5V~5.5V OUT 24V 2W" B0524S-2WR3 79.5,31 r90 top
Y2 "Isolated Power IN 4.5V~5.5V OUT 24V" B0524S-1WR3 5.95,33.073 r90 top
Y3 "Isolated Power 21.6V~26.4V" B0505S-1WR3 30.2,32.805 r90 top

## Footprints (in the part's own frame and the unit in brackets; to place one, negate y for a bottom-side part, rotate by r counter-clockwise, add the part's x,y. Pads: shape width x height; smd on the part's side, far side on the other; paste and mask are expansions set on the pad)
1N4148W [mil]
  rect 37.4x45.3 smd: 1(-76.3,1.82) 2(57,1.82)
  silkscreen extent -74,-35 46,39, body extent -79,-30 66,35, height 47
2MD3T2B1M6RES [mm]
  round 1.699 hole 1.1: 1(2.678,4.68) 2(0.138,4.68) 3(-2.402,4.68) 4(2.678,7.22) 5(0.138,7.22) 6(-2.402,7.22) 7(2.678,-0.4) 8(-2.402,-0.4)
  silkscreen extent -3.96,-4.37 4.24,4.68, body extent -4.06,-15.37 4.08,7.87, height 9.74
74LVC1G14GW,125 [mm]
  rect 1.02x0.4 smd mask+0.06: 1(-0.975,0.65) 2(-0.975,0) 3(-0.975,-0.65) 4(0.975,-0.65) 5(0.975,0.65)
  silkscreen extent -2.13,-1.17 0.68,1.17, body extent -1.06,-1 1.06,1, height 1.1
AD5412AREZ-REEL7 [mil]
  rect 13.5x68.2 smd: 1(-140.7,-112.8) 2(-115.1,-112.8) 3(-89.5,-112.8) 4(-64,-112.8) 5(-38.4,-112.8) 6(-12.8,-112.8) 7(12.8,-112.8) 8(38.4,-112.8) 9(64,-112.8) 10(89.6,-112.8) 11(115.2,-112.8) 12(140.8,-112.8) 13(140.8,112.9) 14(115.2,112.9) 15(89.6,112.9) 16(64,112.9) 17(38.4,112.9) 18(12.8,112.9) 19(-12.8,112.9) 20(-38.4,112.9) 21(-64,112.9) 22(-89.5,112.9) 23(-115.1,112.9) 24(-140.7,112.9)
  rect 196.3x126 smd: 25(0,0)
  silkscreen extent -188,-97 157,70, body extent -153,-128 153,124, height 41
ADS1220IPWR [mil]
  rect 13.5x68.2 smd mask+3.15: 1(-95.48,-110.2) 2(-69.88,-110.2) 3(-44.28,-110.2) 4(-18.68,-110.2) 5(6.82,-110.2) 6(32.42,-110.2) 7(58.02,-110.2) 8(83.62,-110.2) 9(83.62,115.5) 10(58.02,115.5) 11(32.42,115.5) 12(6.82,115.5) 13(-18.68,115.5) 14(-44.28,115.5) 15(-69.88,115.5) 16(-95.48,115.5)
  silkscreen extent -141,-107 96,72, body extent -106,-131 91,121, height 41
ANT_IFA_USB_2_4GHZ_50R [mm]
  rect 5x0.5 smd paste+0 mask+0.102: 1(2.05,-5.15)
  rect 0.5x4.9 smd paste+0 mask+0.102: 1(2.1,-2.45)
  rect 0.5x2.64 smd paste+0 mask+0.102: 1(4.3,-3.58) 1(6.8,-3.58) 1(9,-3.58) 1(11.5,-3.58)
  rect 2x0.5 smd paste+0 mask+0.102: 1(5.55,-2.51) 1(10.25,-2.51)
  rect 2.7x0.5 smd paste+0 mask+0.102: 1(7.9,-5.15) 1(12.6,-5.15)
  rect 0.5x3.94 smd paste+0 mask+0.102: 1(13.7,-2.93)
  rect 0.9x4.9 smd paste+0 mask+0.102: 2(0,-2.45)
AO3400A [mm]
  rect 1.25x0.7 smd: D(-0.899,-0.015) G(1.101,-0.965) S(1.101,0.935)
  silkscreen extent -0.63,-1.54 0.83,1.51, body extent -1.29,-1.44 1.51,1.46, height 1.25
AP63301WU-7 [mm]
  rect 0.8x0.532 smd mask+0.08: 1(1.132,-1.052) 2(1.132,-0.102) 3(1.132,0.848) 4(-1.268,0.848) 5(-1.268,-0.102) 6(-1.268,-1.052)
  silkscreen extent -0.94,-2.15 1.42,1.42, body extent -1.52,-1.56 1.38,1.34, height 1
B0505S-1WR3 [mil]
  rect 63x63 hole 39.4: 1(-143.1,-105.47)
  round 63 hole 39.4: 2(-43.1,-105.47) 3(56.9,-105.47) 4(156.9,-105.47)
  silkscreen extent -219,-133 233,103, body extent -219,-131 234,105, height 398
B0524S-1WR3 [mm]
  round 1.801 hole 1.001: 1(-3.901,-2.184) 2(-1.361,-2.184) 3(1.179,-2.184) 4(3.719,-2.184)
  silkscreen extent -5.84,-4.09 5.66,3.12, body extent -5.91,-2.84 5.6,3.16, height 10.1
B0524S-2WR3 [mil]
  rect 63x63 hole 35.4: 1(-295.38,108.52)
  round 63 hole 35.4: 2(-195.38,108.52) 4(4.62,108.52) 6(204.62,108.52)
  silkscreen extent -382,-132 395,149, body extent -381,-133 392,145, height 406
BAT54S [mm]
  rect 1.001x0.65 smd: 1(0.823,-1.226) 2(0.823,0.673) 3(-1.176,-0.276)
  silkscreen extent -0.9,-1.8 0.55,1.25, body extent -1.3,-1.8 1.2,1.1, height 1.05
BSMD1812-010-60V [mm]
  rect 1.407x3.5 smd paste-100 mask+0.051: 1(-1.854,-0.025) 2(1.854,-0.025)
  silkscreen extent -2.79,-2.06 2.79,2.01, body extent -2.22,-1.63 2.28,1.57, height 1.04
BSP315P [mm]
  rect 2.499x1.1 smd: 1(3.172,-2.301) 2(3.172,0) 3(3.172,2.299)
  rect 2.339x3.599 smd: 2(-2.766,0)
  silkscreen extent -1.37,-3.33 1.57,3.33, body extent -3.2,-3.18 3.8,3.22, height 1.67
BZT52C15 [mil]
  rect 35.8x48 smd: 1(-67.1,-0.5) 2(61.7,-0.5)
  silkscreen extent -66,-40 52,39, body extent -79,-32 67,31, height 50
CAP_0402 [mm]
  rrect25% 0.6x0.7 smd: 1(-0.5,0) 2(0.5,0)
  body extent -0.5,-0.26 0.5,0.26, height 0.37
CAP_0603 [mm]
  rrect25% 0.8x1 smd: 1(-0.75,0) 2(0.75,0)
  body extent -0.8,-0.4 0.8,0.4, height 0.51
CAP_0805 [mm]
  rrect25% 1.4x1.7 smd: 1(-1.143,0) 2(1.143,0)
  body extent -1.15,-0.76 1.15,0.79, height 1.01
CAP_ALEL_5x5.4 [mil]
  rect 110.2x43.3 smd: 1(-79.9,-3.3) 2(85.5,-3.3)
  silkscreen extent -102,-106 108,101, body extent -117,-105 119,103, height 227
CAP_ALEL_6.3x5.4 [mm]
  rect 3.5x1.199 smd: 1(-2.325,-0.225) 2(2.619,-0.18)
  silkscreen extent -3.43,-3.56 3.33,3.2, body extent -3.7,-3.5 3.6,3.1, height 5.82
ESP32-S3FN8 [mm]
  rrect25% 0.81x0.22 smd mask+0.07: 1(-3.445,2.617) 2(-3.445,2.217) 3(-3.445,1.817) 4(-3.445,1.417) 5(-3.445,1.017) 6(-3.445,0.617) 7(-3.445,0.217) 8(-3.445,-0.183) 9(-3.445,-0.583) 10(-3.445,-0.983) 11(-3.445,-1.383) 12(-3.445,-1.783) 13(-3.445,-2.183) 14(-3.445,-2.583) 29(3.445,-2.583) 30(3.445,-2.183) 31(3.445,-1.783) 32(3.445,-1.383) 33(3.445,-0.983) 34(3.445,-0.583) 35(3.445,-0.183) 36(3.445,0.217) 37(3.445,0.617) 38(3.445,1.017) 39(3.445,1.417) 40(3.445,1.817) 41(3.445,2.217) 42(3.445,2.617)
  rrect25% 0.22x0.81 smd mask+0.07: 15(-2.6,-3.428) 16(-2.2,-3.428) 17(-1.8,-3.428) 18(-1.4,-3.428) 19(-1,-3.428) 20(-0.6,-3.428) 21(-0.2,-3.428) 22(0.2,-3.428) 23(0.6,-3.428) 24(1,-3.428) 25(1.4,-3.428) 26(1.8,-3.428) 27(2.2,-3.428) 28(2.6,-3.428) 43(2.6,3.462) 44(2.2,3.462) 45(1.8,3.462) 46(1.4,3.462) 47(1,3.462) 48(0.6,3.462) 49(0.2,3.462) 50(-0.2,3.462) 51(-0.6,3.462) 52(-1,3.462) 53(-1.4,3.462) 54(-1.8,3.462) 55(-2.2,3.462) 56(-2.6,3.462)
  rect 4x4 smd paste-3: 57(0,0.017)
  silkscreen extent -4.15,-3.48 3.5,3.6, body extent -3.5,-3.48 3.5,3.52, height 0.9
FB_0402 [mm]
  rrect25% 0.6x0.7 smd: 1(-0.5,0) 2(0.5,0)
  body extent -0.5,-0.25 0.5,0.25, height 0.51
FIDUCIAL [mil]
  round 40 smd mask+20: 1(0,0)
  Top Layer pour cut-out: 40.35,0 38.97,10.44 34.94,20.17 28.53,28.53 20.17,34.94 10.44,38.97 0,40.35 0,40.35 -10.44,38.97 -20.17,34.94 -28.53,28.53 -34.94,20.17 -38.97,10.44 -40.35,0 -40.35,0 -38.97,-10.44 -34.94,-20.17 -28.53,-28.53 -20.17,-34.94 -10.44,-38.97 0,-40.35 0,-40.35 10.44,-38.97 20.17,-34.94 28.53,-28.53 34.94,-20.17 38.97,-10.44 40.35,0
  body extent -40,-40 40,40, height 0
FXL0530-6R8-M [mm]
  rect 1.9x2.5 smd: 1(-2.1,0) 2(2,0)
  silkscreen extent -2.75,-2.6 2.65,2.6, body extent -2.75,-2.66 2.65,2.54, height 1.8
HT7333-A [mil]
  rect 62x26.5 smd paste+0 mask+2: 1(91.5,-59.1) 3(91.5,59)
  round 37.4 smd: 2(0,0)
  Top Layer region: -51.8,37.4 21.2,37.4 22.9,37.3 24.7,37.2 26.4,37 28.2,36.7 29.9,36.3 31.6,35.9 33.2,35.4 34.9,34.8 36.5,34.1 38.1,33.3 39.6,32.5 41.1,31.6 42.6,30.6 44,29.6 45.4,28.5 46.7,27.3 47.9,26.1 49.1,24.8 50.3,23.5 51.3,22.1 52.4,20.7 53.3,19.2 54.2,17.6 54.9,16.1 55.7,13 122.5,13 122.5,-13 55.7,-13 54.9,-16.1 54.2,-17.7 53.3,-19.2 52.4,-20.7 51.3,-22.2 50.3,-23.5 49.1,-24.9 47.9,-26.2 46.7,-27.4 45.4,-28.6 44,-29.7 42.6,-30.7 41.1,-31.7 39.6,-32.6 38.1,-33.4 36.5,-34.2 34.9,-34.8 33.2,-35.4 31.6,-36 29.9,-36.4 28.2,-36.8 26.4,-37.1 24.7,-37.3 22.9,-37.4 21.2,-37.4 -51.8,-37.4 -53.6,-37.4 -55.3,-37.3 -57.1,-37.1 -58.8,-36.8 -60.5,-36.4 -62.2,-36 -63.9,-35.4 -65.5,-34.8 -67.1,-34.2 -68.7,-33.4 -70.3,-32.6 -71.8,-31.7 -73.2,-30.7 -74.6,-29.7 -76,-28.6 -77.3,-27.4 -78.6,-26.2 -79.8,-24.9 -80.9,-23.5 -82,-22.2 -83,-20.7 -83.9,-19.2 -84.8,-17.7 -85.6,-16.1 -86.3,-14.5 -86.9,-12.9 -87.5,-11.3 -88,-9.6 -88.4,-7.9 -88.7,-6.1 -89,-4.4 -89.1,-2.7 -89.2,-0.9 -89.2,0.8 -89.1,2.6 -89,4.3 -88.7,6.1 -88.4,7.8 -88,9.5 -87.5,11.2 -86.9,12.9 -86.3,14.5 -85.6,16.1 -84.8,17.6 -83.9,19.2 -83,20.7 -82,22.1 -80.9,23.5 -79.8,24.8 -78.6,26.1 -77.3,27.3 -76,28.5 -74.6,29.6 -73.2,30.6 -71.8,31.6 -70.3,32.5 -68.7,33.3 -67.1,34.1 -65.5,34.8 -63.9,35.4 -62.2,35.9 -60.5,36.3 -58.8,36.7 -57.1,37 -55.3,37.2 -53.6,37.3 -51.8,37.4
  silkscreen extent -39,-92 66,92, body extent -43,-86 118,84, height 59
IND-SMD_L4.4-W4.2 [mm]
  rect 1.4x2.4 smd: 1(1.962,0.017) 2(-2.094,0.017)
  silkscreen extent -2.34,-2.16 2.21,2.19, body extent -2.3,-2.1 2.3,2.1, height 2
IND_0402 [mm]
  rrect25% 0.6x0.7 smd: 1(-0.5,0) 2(0.5,0)
  body extent -0.56,-0.26 0.56,0.26, height 0.67
IRLR3110ZTRPBF [mm]
  rect 1.27x2.54 smd: 1(-2.292,-5.499) 3(2.285,-5.496)
  rect 5.4x6.101 smd: 2(-0.006,1.994)
  silkscreen extent -3.31,-3.22 3.3,4.15, body extent -3.08,-5.57 3.27,4.1, height 2.31
JK-nSMD010/60V [mil]
  rect 46.9x68 smd: 1(-57.6,-2) 2(56.2,-2)
  silkscreen extent -90,-45 89,41, body extent -65,-35 61,31, height 24
KLJ-4020 [mm]
  rect 1.001x1.801 smd: 1(-1.888,-0.074) 2(1.613,-0.074)
  silkscreen extent -2.14,-2.07 1.86,1.92, body extent -2.13,-2.1 1.87,1.91, height 2.01
LED_0603_BLUE [mm]
  rrect25% 0.8x1 smd: A(0.75,0) K(-0.75,0)
  silkscreen extent -1.5,-0.8 -0.8,0.8, body extent -0.8,-0.4 0.8,0.4, height 0.6
LED_0603_YELLOW [mm]
  rrect25% 0.8x1 smd: A(0.75,0) K(-0.75,0)
  silkscreen extent -1.5,-0.8 -0.8,0.8, body extent -0.8,-0.4 0.8,0.4, height 0.6
LM317LDR2G [mm]
  rect 0.569x1.951 smd: 1(-1.946,-2.606) 2(-0.676,-2.606) 3(0.594,-2.606) 4(1.864,-2.606) 5(1.864,2.805) 6(0.594,2.805) 7(-0.676,2.805) 8(-1.946,2.805)
  silkscreen extent -2.54,-1.4 2.46,1.6, body extent -2.53,-2.83 2.37,3.17, height 1.7
LM27761DSGR [mil]
  rect 11x19.9 smd mask+2.36: 1(-29.6,-36.5) 2(-9.9,-36.5) 3(9.8,-36.5) 4(29.5,-36.5) 5(29.5,36.5) 6(9.8,36.5) 7(-9.9,36.5) 8(-29.6,36.5)
  rect 63x35.4 smd mask+2.36: 9(-2.95,-1.97)
  silkscreen extent -58,-63 42,42, body extent -39,-39 39,40, height 32
mSMD050-60V [mil]
  rect 55.4x137.8 smd paste-3937 mask+2: 1(-73,0) 2(73,0)
  silkscreen extent -110,-80 110,80, body extent -90,-64 88,62, height 41
NSI8262W1-DSWR [mm]
  rect 0.599x2.301 smd: 1(-4.582,-4.843) 2(-3.312,-4.843) 3(-2.042,-4.843) 4(-0.772,-4.843) 5(0.498,-4.843) 6(1.768,-4.843) 7(3.038,-4.843) 8(4.308,-4.843) 9(4.308,5.157) 10(3.038,5.157) 11(1.768,5.157) 12(0.498,5.157) 13(-0.772,5.157) 14(-2.042,5.157) 15(-3.312,5.157) 16(-4.582,5.157)
  silkscreen extent -6.11,-4.82 4.96,3.96, body extent -5.27,-5.06 4.98,5.26, height 2.5
OP184ESZ-REEL7 [mm]
  rect 0.587x1.801 smd paste+0: 1(-1.562,-2.758) 2(-0.292,-2.758) 3(0.978,-2.758) 4(2.248,-2.758) 5(2.248,2.441) 6(0.978,2.441) 7(-0.292,2.441) 8(-1.562,2.441)
  silkscreen extent -2.18,-1.68 2.87,1.36, body extent -2.15,-3.16 2.75,2.84, height 1.66
OT32254.096MJBA4SL [mm]
  rect 1.4x1.199 smd: 1(-1.1,-0.95) 2(1.1,-0.95) 3(1.1,0.95) 4(-1.1,0.95)
  silkscreen extent -2.54,-2.29 2.1,1.7, body extent -1.58,-1.23 1.63,1.27, height 0.81
RES_0402 [mm]
  rrect25% 0.6x0.7 smd: 1(-0.5,0) 2(0.5,0)
  body extent -0.5,-0.25 0.5,0.25, height 0.3
RES_0603 [mm]
  rrect25% 0.8x1 smd: 1(-0.75,0) 2(0.75,0)
  body extent -0.8,-0.43 0.8,0.43, height 0.52
RES_0805 [mm]
  rrect25% 1x1.7 smd: 1(-0.95,0) 2(0.95,0)
  body extent -1,-0.63 1,0.63, height 0.47
RES_2010 [mm]
  rect 1.283x2.7 smd paste-100 mask+0.051: 1(-2.686,0.055) 2(2.096,0.055)
  silkscreen extent -3.75,-1.75 3.25,2, body extent -2.75,-1.2 2.25,1.3, height 0.66
RES_2512 [mm]
  rect 1.45x2.9 smd: 1(-3.325,0.017) 2(3.325,0.017)
  silkscreen extent -2.28,-1.58 2.28,1.62, body extent -3.1,-1.55 3.3,1.65, height 0.6
SMAJ24CA [mm]
  rect 1.999x1.801 smd: 1(-2.022,0.02) 2(1.976,0.02)
  silkscreen extent -2.32,-1.38 2.28,1.42, body extent -2.42,-1.19 2.62,1.43, height 2.21
SMAJ30CA [mm]
  rect 1.999x1.801 smd: 1(-2.022,0.02) 2(1.976,0.02)
  silkscreen extent -2.32,-1.38 2.28,1.42, body extent -2.42,-1.19 2.62,1.43, height 2.21
SMAJ33CA [mm]
  rect 1.999x1.801 smd: 1(-2.022,0.02) 2(1.976,0.02)
  silkscreen extent -2.32,-1.38 2.28,1.42, body extent -2.42,-1.19 2.62,1.43, height 2.21
SMBJ13CA [mm]
  rect 2.047x2.4 smd: 1(-2.43,0.025) 2(2.352,0.025)
  silkscreen extent -2.71,-1.88 2.7,1.93, body extent -2.68,-1.82 2.72,1.78, height 2.1
SMF6.0CA [mm]
  rect 1.4x1.2 smd: 1(-1.738,-0.031) 2(1.732,-0.031)
  silkscreen extent -1.38,-0.96 1.37,0.9, body extent -1.74,-0.93 1.96,0.87, height 1.3
SS8050 [mm]
  rect 1x0.65 smd: B(0.942,-0.838) C(-1.058,0.112) E(0.942,1.062)
  silkscreen extent -0.78,-1.41 0.67,1.64, body extent -1.24,-1.33 1.11,1.59, height 1.12
TJ-L3F2LTQYKMQFLC7K-A5 [mil]
  round 60 hole 36: 1(-48.08,123.03) 2(51.92,123.03) 3(-48.08,23.03) 4(51.92,23.03)
  silkscreen extent -89,-202 93,165, body extent -93,-289 89,163, height 394
"TP 1mm" [mm] "1 mm Probe Pad"
  round 1 smd: 1(0,0)
TPD2E2U06DRLR [mm]
  rrect25% 0.66x0.3 smd mask+0.06: 1(-0.735,0.5) 2(-0.735,0) 3(-0.735,-0.5) 4(0.735,-0.5) 5(0.735,0.5)
  silkscreen extent -1.47,-0.97 0.6,1.07, body extent -0.85,-0.83 0.75,0.77, height 0.6
TS-1088-AR02016 [mm]
  rect 1.23x1.36 smd: 1(-2.159,0) 2(2.211,0)
  silkscreen extent -2,-1.62 2.28,1.62, body extent -2.4,-1.45 2.4,1.45, height 2.2
TYPEC-305-ACP16H458 [mil]
  oval 70.9x33.9 hole 19.7 slot 55.1 at 0 deg: 1(-152.2,78.38) 1(-152.2,-81.42) 1(87.9,-81.42) 1(88,78.38)
  rect 15.7x43.3 smd paste-3937 mask+2: A1B12(-132.5,-35.02) A1B12(-132.5,31.98) A4B9(-101,-35.02) A4B9(-101,31.98) A5(-73.5,31.98) A6(-45.9,31.98) A7(-18.3,31.98) A8(9.2,31.98) B1A12(68.3,-35.02) B1A12(68.3,31.98) B4A9(36.8,31.98) B4A9(36.8,-35.02) B5(9.2,-35.02) B6(-18.3,-35.02) B7(-45.9,-35.02) B8(-73.5,-35.02)
  Keep-Out Layer board cut-out: -157.1,-1.52 -157.5,-5.02 -158.7,-8.42 -160.6,-11.32 -163.1,-13.82 -166,-15.72 -169.4,-16.92 -172.9,-17.32 -176.4,-16.92 -179.7,-15.72 -182.7,-13.82 -185.2,-11.32 -187.1,-8.42 -188.2,-5.02 -188.6,-1.52 -188.2,1.98 -187.1,5.28 -185.2,8.28 -182.7,10.78 -179.7,12.68 -176.4,13.78 -172.9,14.18 -169.4,13.78 -166,12.68 -163.1,10.78 -160.6,8.28 -158.7,5.28 -157.5,1.98 -157.1,-1.52
  Keep-Out Layer board cut-out: 124.4,-1.52 124,-5.02 122.8,-8.42 120.9,-11.32 118.4,-13.82 115.5,-15.72 112.1,-16.92 108.6,-17.32 105.1,-16.92 101.8,-15.72 98.8,-13.82 96.3,-11.32 94.4,-8.42 93.3,-5.02 92.9,-1.52 93.3,1.98 94.4,5.28 96.3,8.28 98.8,10.78 101.8,12.68 105.1,13.78 108.6,14.18 112.1,13.78 115.5,12.68 118.4,10.78 120.9,8.28 122.8,5.28 124,1.98 124.4,-1.52
  Keep-Out Layer region: -157.1,-1.52 -157.5,-5.02 -158.7,-8.42 -160.6,-11.32 -163.1,-13.82 -166,-15.72 -169.4,-16.92 -172.9,-17.32 -176.4,-16.92 -179.7,-15.72 -182.7,-13.82 -185.2,-11.32 -187.1,-8.42 -188.2,-5.02 -188.6,-1.52 -188.2,1.98 -187.1,5.28 -185.2,8.28 -182.7,10.78 -179.7,12.68 -176.4,13.78 -172.9,14.18 -169.4,13.78 -166,12.68 -163.1,10.78 -160.6,8.28 -158.7,5.28 -157.5,1.98 -157.1,-1.52
  Keep-Out Layer region: -157.1,-1.52 -157.5,-5.02 -158.7,-8.42 -160.6,-11.32 -163.1,-13.82 -166,-15.72 -169.4,-16.92 -172.9,-17.32 -176.4,-16.92 -179.7,-15.72 -182.7,-13.82 -185.2,-11.32 -187.1,-8.42 -188.2,-5.02 -188.6,-1.52 -188.2,1.98 -187.1,5.28 -185.2,8.28 -182.7,10.78 -179.7,12.68 -176.4,13.78 -172.9,14.18 -169.4,13.78 -166,12.68 -163.1,10.78 -160.6,8.28 -158.7,5.28 -157.5,1.98 -157.1,-1.52
  Keep-Out Layer region: 124.4,-1.52 124,-5.02 122.8,-8.42 120.9,-11.32 118.4,-13.82 115.5,-15.72 112.1,-16.92 108.6,-17.32 105.1,-16.92 101.8,-15.72 98.8,-13.82 96.3,-11.32 94.4,-8.42 93.3,-5.02 92.9,-1.52 93.3,1.98 94.4,5.28 96.3,8.28 98.8,10.78 101.8,12.68 105.1,13.78 108.6,14.18 112.1,13.78 115.5,12.68 118.4,10.78 120.9,8.28 122.8,5.28 124,1.98 124.4,-1.52
  Keep-Out Layer region: 124.4,-1.52 124,-5.02 122.8,-8.42 120.9,-11.32 118.4,-13.82 115.5,-15.72 112.1,-16.92 108.6,-17.32 105.1,-16.92 101.8,-15.72 98.8,-13.82 96.3,-11.32 94.4,-8.42 93.3,-5.02 92.9,-1.52 93.3,1.98 94.4,5.28 96.3,8.28 98.8,10.78 101.8,12.68 105.1,13.78 108.6,14.18 112.1,13.78 115.5,12.68 118.4,10.78 120.9,8.28 122.8,5.28 124,1.98 124.4,-1.52
  Keep-Out Layer lines w0.1: 108.6,-17.32 105.1,-16.92 101.8,-15.72 98.8,-13.82 96.3,-11.32 94.4,-8.42 93.3,-5.02 92.9,-1.52 93.3,1.98 94.4,5.28 96.3,8.28 98.8,10.78 101.8,12.68 105.1,13.78 108.6,14.18 112.1,13.78 115.5,12.68 118.4,10.78 120.9,8.28 122.8,5.28 124,1.98 124.4,-1.52 124,-5.02 122.8,-8.42 120.9,-11.32 118.4,-13.82 115.5,-15.72 112.1,-16.92 108.6,-17.32 ; -172.9,-17.32 -176.4,-16.92 -179.7,-15.72 -182.7,-13.82 -185.2,-11.32 -187.1,-8.42 -188.2,-5.02 -188.6,-1.52 -188.2,1.98 -187.1,5.28 -185.2,8.28 -182.7,10.78 -179.7,12.68 -176.4,13.78 -172.9,14.18 -169.4,13.78 -166,12.68 -163.1,10.78 -160.6,8.28 -158.7,5.28 -157.5,1.98 -157.1,-1.52 -157.5,-5.02 -158.7,-8.42 -160.6,-11.32 -163.1,-13.82 -166,-15.72 -169.4,-16.92 -172.9,-17.32
  silkscreen extent -188,-80 197,77, body extent -193,-93 358,78, height 389
WJ15EDGK-3.81-2P [mm]
  body extent -3.92,-15.61 4.49,-0.01, height 7.6
WJ15EDGRC-3.81-2P [mm]
  rect 2.2x2.2 hole 1.26: 1(-1.966,3.217)
  round 2.2 hole 1.26: 2(1.844,3.217)
  silkscreen extent -4.31,-1.72 4.19,4.82, body extent -4.14,-4.43 4.27,4.77, height 7.2
WJ500V-5.08-4P [mm]
  round 2.3 hole 1.5 paste+0 mask+0.05: 1(-7.401,0.18) 2(-2.321,0.18) 3(2.759,0.18) 4(7.839,0.18)
  silkscreen extent -9.94,-5.02 10.38,5.18, body extent -10.69,-4.87 10.23,5.33, height 14
WJ500V-5.08-5P [mm]
  round 2.3 hole 1.5 paste+0 mask+0.05: 1(-10.16,-0.025) 2(-5.08,-0.025) 3(0,-0.025) 4(5.08,-0.025) 5(10.16,-0.025)
  silkscreen extent -12.7,-5.23 12.7,4.98, body extent -13.28,-5.33 12.73,4.87, height 14
XL-2012RGBC [mm]
  rect 0.55x0.55 smd mask+0.06: 1(0.682,-0.35) 2(-0.868,-0.35) 3(0.682,0.45) 4(-0.868,0.45)
  silkscreen extent -0.36,-0.58 1.18,1.27, body extent -1.1,-0.6 0.9,0.7, height 0.51
XTAL_3225 [mm]
  rrect10% 1.3x1.1 smd: 1(-1.15,-0.95) 2(1.15,-0.95) 3(1.15,0.95) 4(-1.15,0.95)
  silkscreen extent -2.23,-1.89 -1,-1, body extent -1.6,-1.28 1.6,1.22, height 0.61